# Altium PCB honggan_ant2.PcbDoc
Units mm, origin at the board's own origin, x right, y up, seen from the top; angles counter-clockwise.
Board outline 48 x 36 mm, 4 copper layers (Top Layer, Layer 1, Layer 2, Bottom Layer), stack 0.603 mm thick; 102 components, 55 nets, 316 pads, 698 vias.
Unrouted connection lines stored in the file: 245.
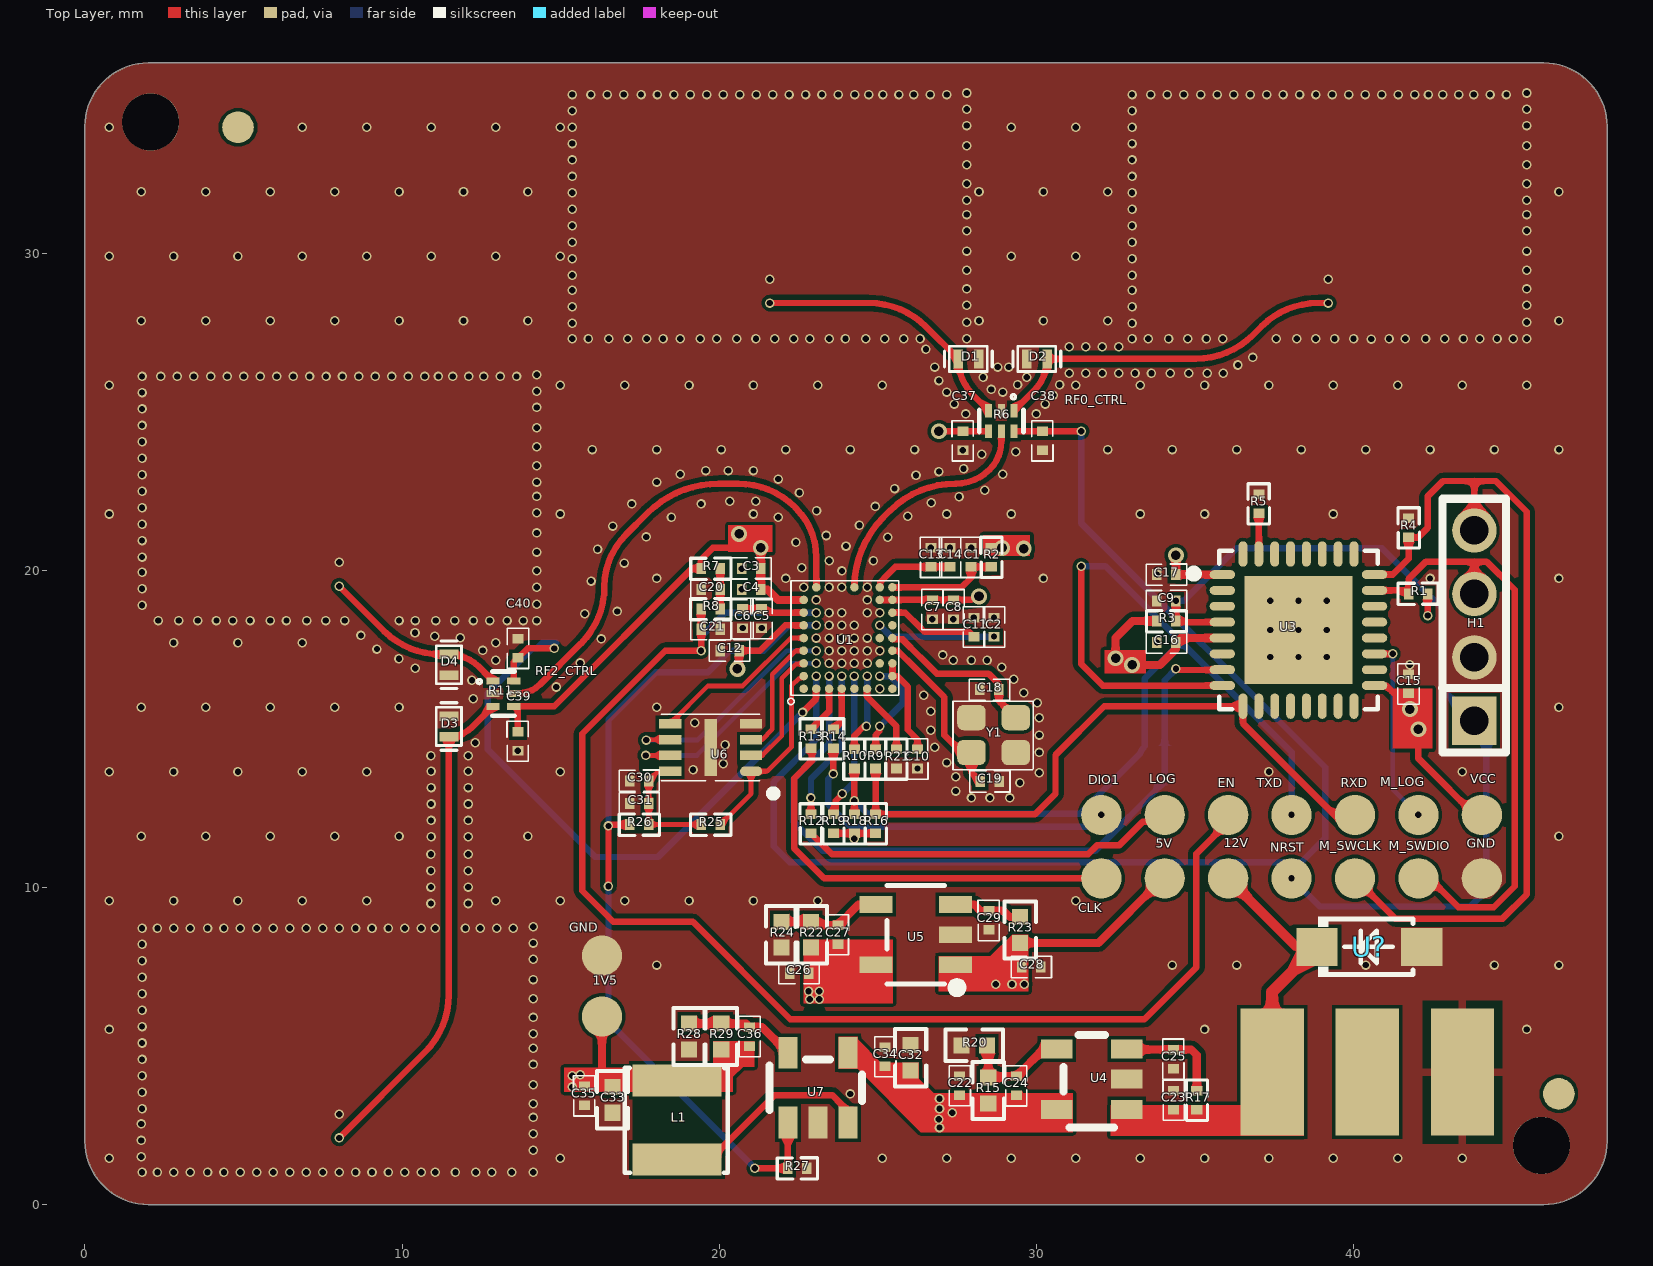
[diagram p0: Top Layer view]
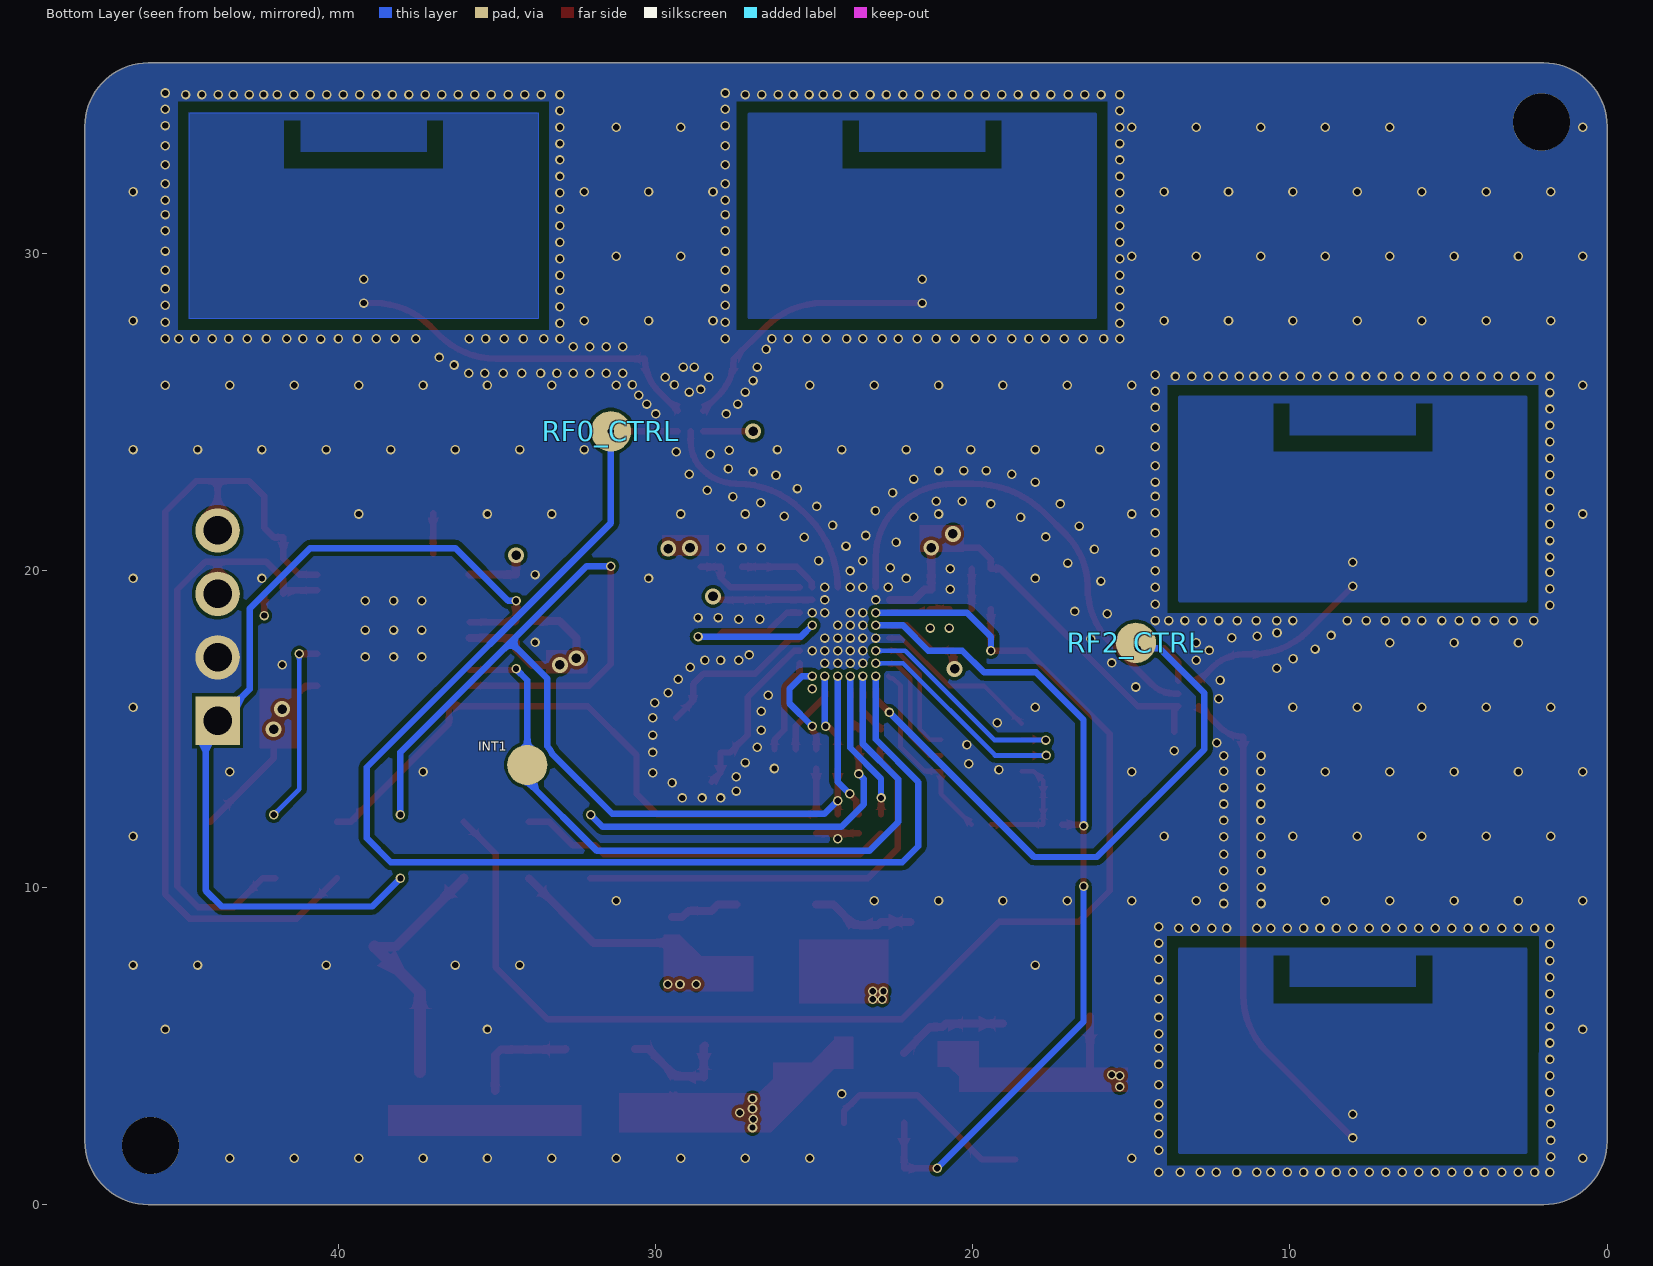
[diagram p1: Bottom Layer view, seen from below]
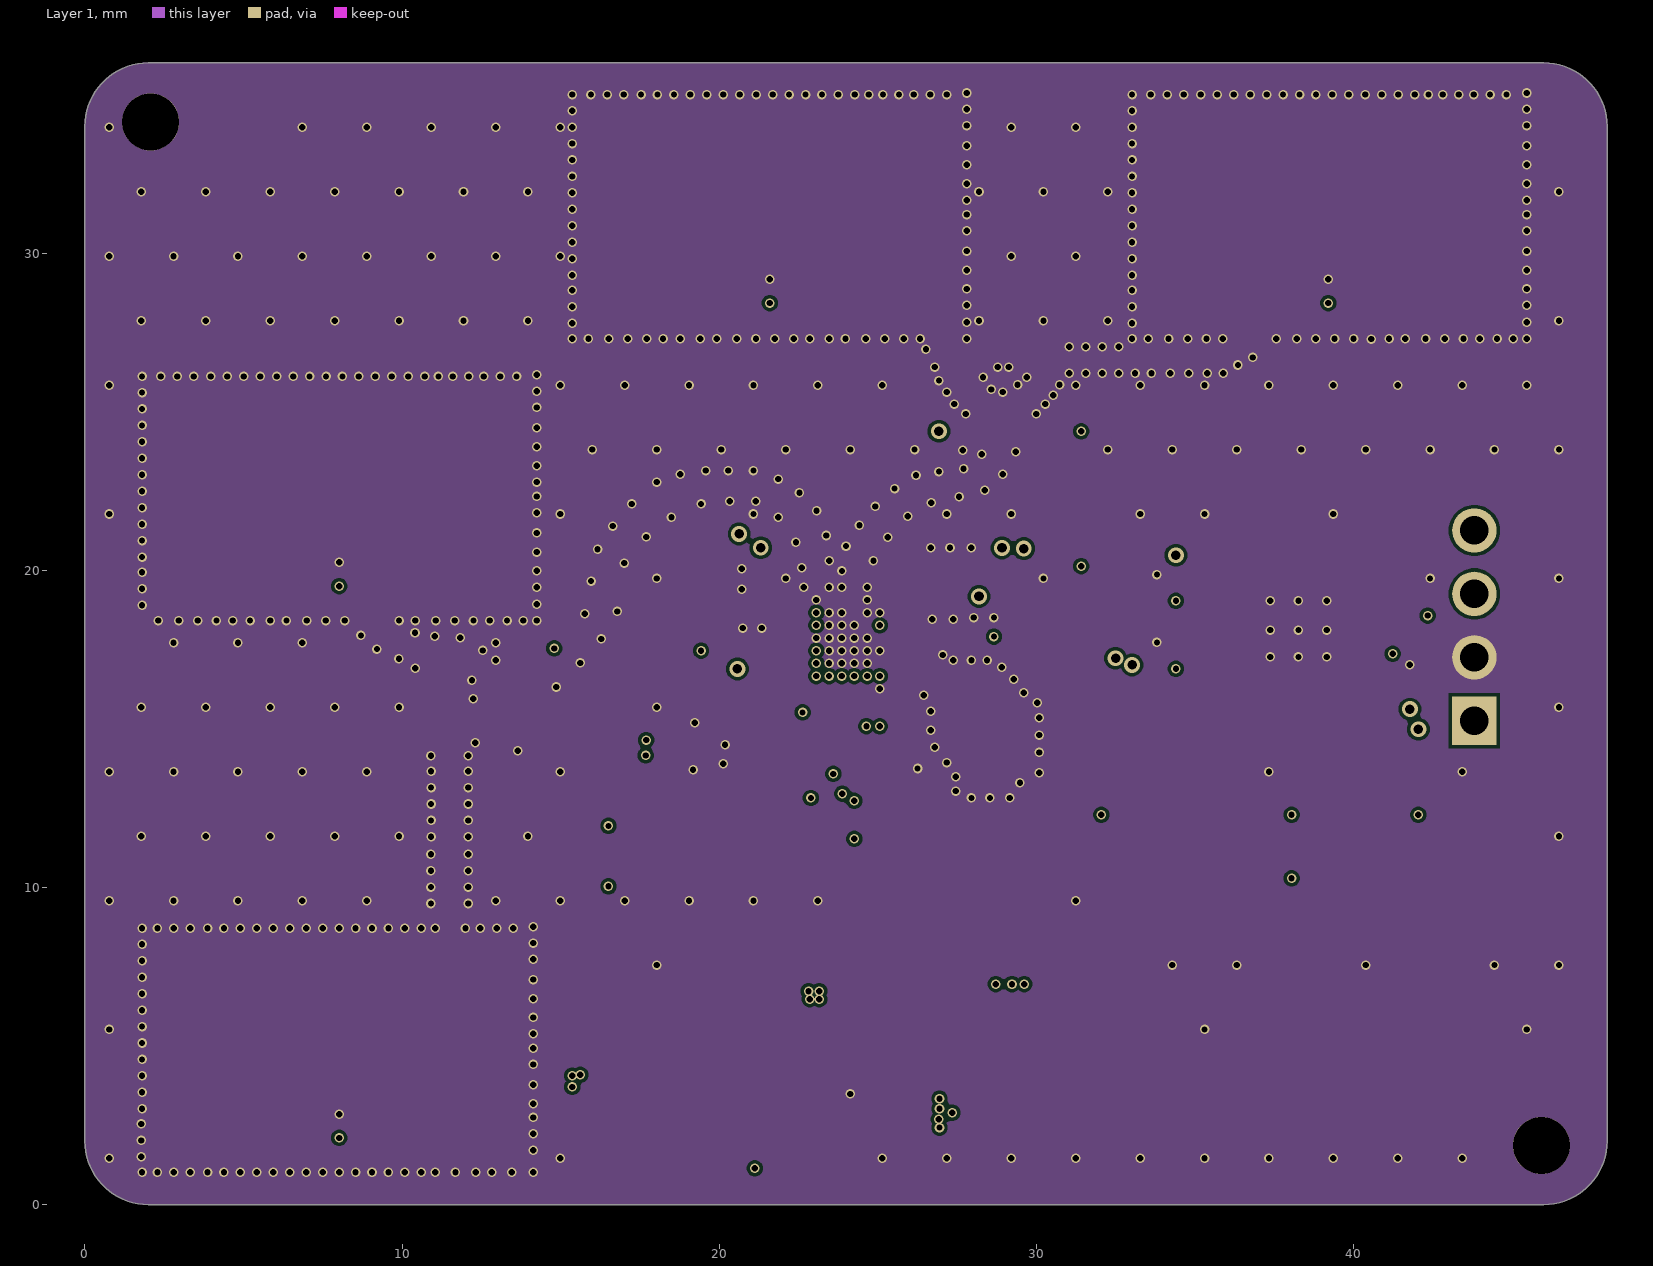
[diagram p2: Layer 1]
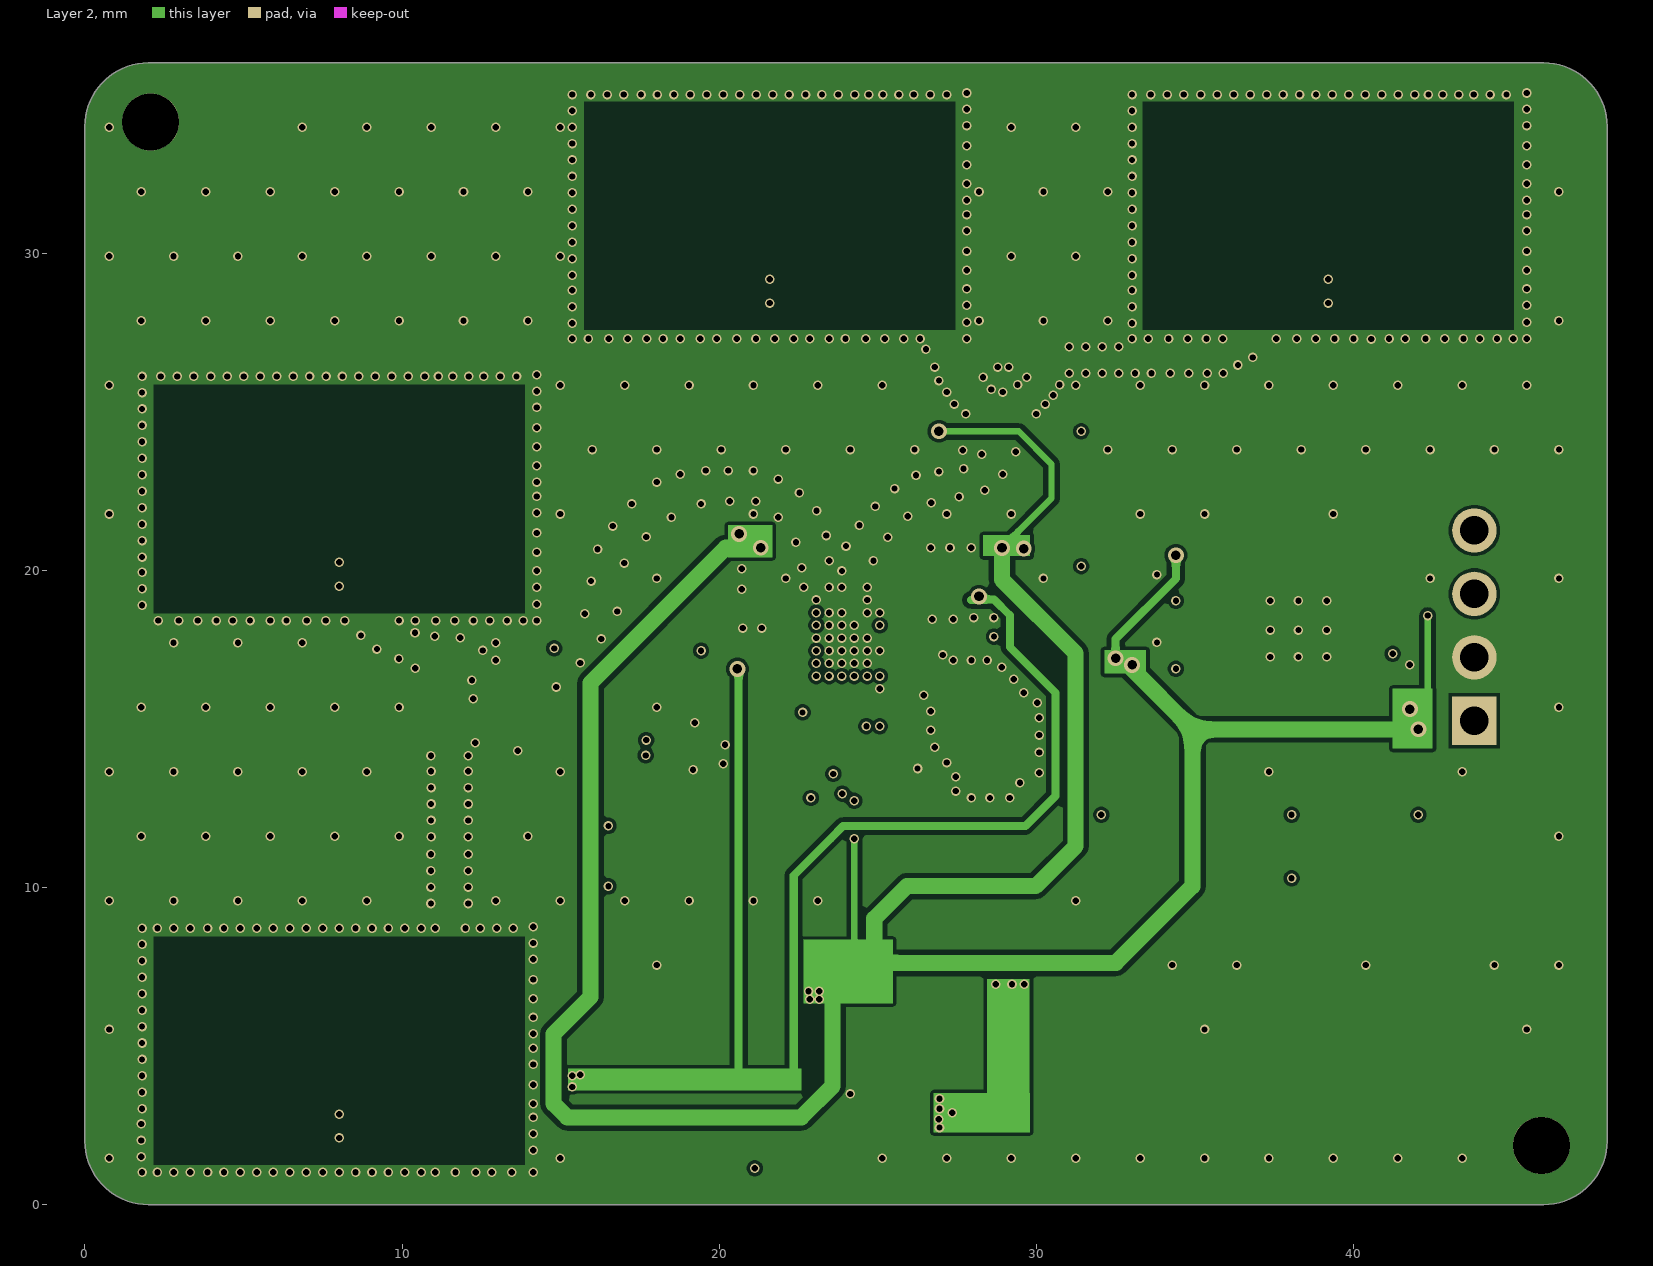
[diagram p3: Layer 2]
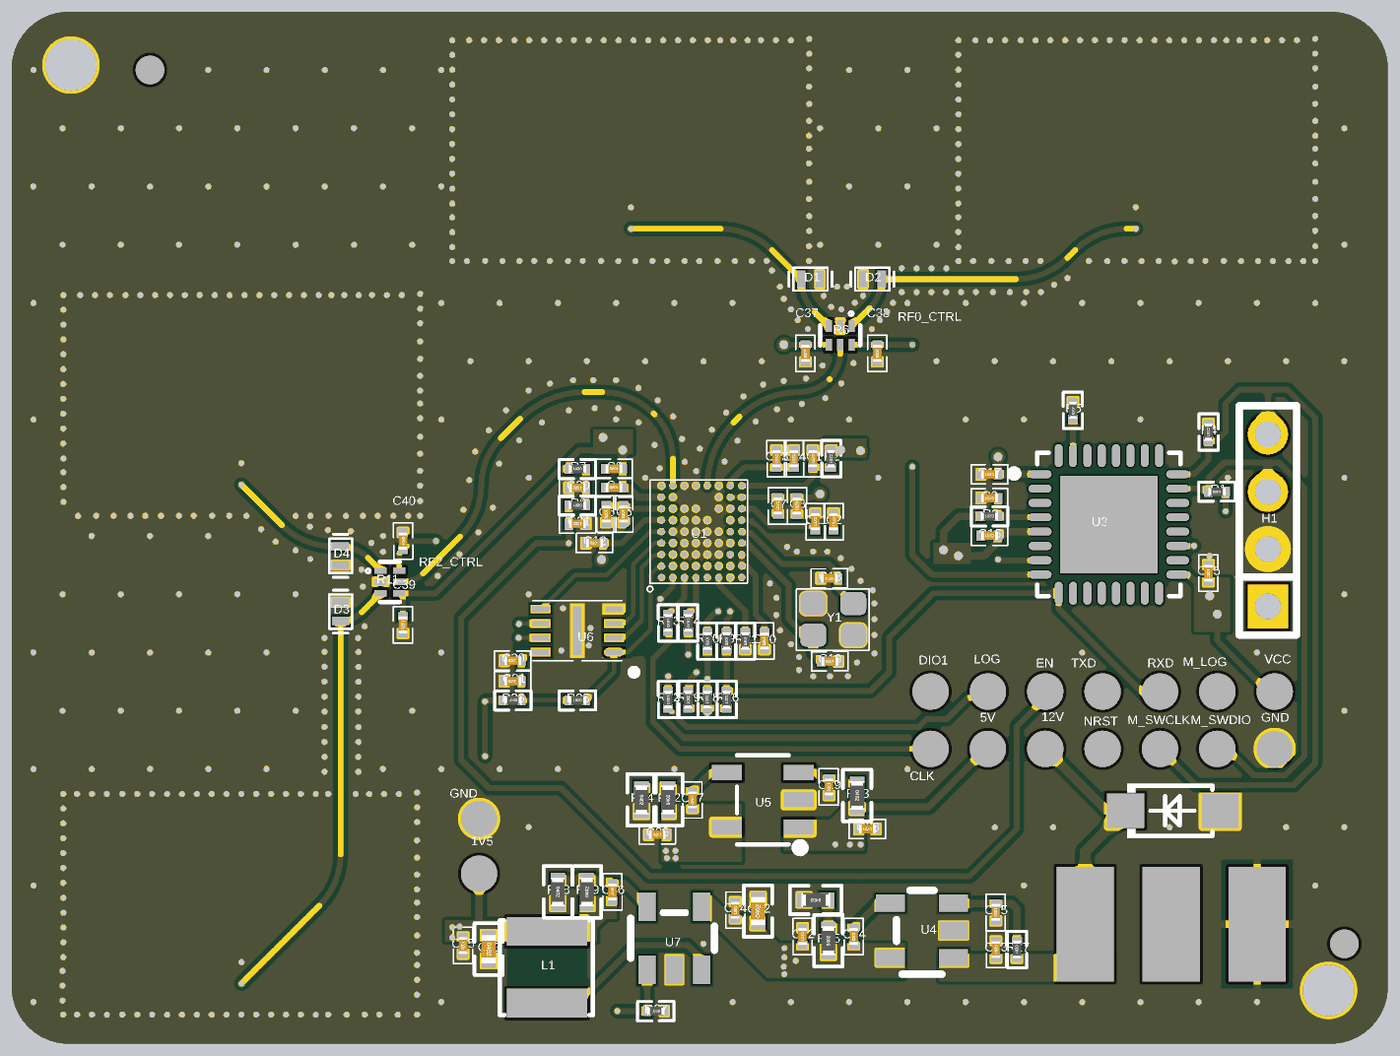
[diagram p4: 3D render of the assembled board from above, using the file's embedded part models]

## Layer stack, top to bottom
Top Solder: solder mask 0.0102, Solder Resist, Dk 3.5
Top Layer: signal copper 0.0356
Dielectric 2: prepreg 0.0711, PP-006, Dk 4.1
Layer 1: signal copper 0.035
Dielectric 1: dielectric 0.32, FR-4, Dk 4.8
Layer 2: signal copper 0.035
Dielectric 3: prepreg 0.0711, PP-006, Dk 4.1
Bottom Layer: signal copper 0.0356
Bottom Solder: solder mask 0.0102, Solder Resist, Dk 3.5

## Board outline
0,2 0,34 cw(c2,34) 2,36 46,36 cw(c46,34) 48,34 48,2 cw(c46,2) 46,0 2,0 cw(c2,2)

## Design rules (kind name [scope] priority, off if disabled: settings)
Clearance [All] p1: gap=0.102 ignorepadtopadclearanceinfootprint=TRUE except(0.099: Via-Via; 0.152: Arc-Fill Arc-Poly Arc-Region Track-Fill Track-Poly Track-Region)
HoleToHoleClearance [All] p1: gap=0 allowstackedmicrovias=TRUE
MinimumSolderMaskSliver [All] p1: minsoldermaskwidth=0
PolygonConnect [All] p1: connectstyle=Direct reliefconductorwidth=0.254 reliefentries=4 polygonreliefangle="90 Angle" airgapwidth=0.254
RoutingVias [All] p1: holewidth=0.711 width=1.27 viastyle="Through Hole" minholewidth=0.711 minwidth=1.27 maxholewidth=0.711 maxwidth=1.27
SilkToSilkClearance [All] p1: silktosilkclearance=0
SilkToSolderMaskClearance [IsPad] p1: minsilkscreentomaskgap=0 clearancetoexposedcopper=TRUE
SolderMaskExpansion [All] p1: expansion=0.102 istentingtop=FALSE
SupplyNets "Schematic Supply Nets_4" [InNet('+12V')] p1: voltage=0.000
SupplyNets "Schematic Supply Nets_3" [InNet('VCC')] p2: voltage=0.000
SupplyNets "Schematic Supply Nets_2" [InNet('+5V')] p3: voltage=0.000
SupplyNets "Schematic Supply Nets_1" [InNet('GND')] p4: voltage=0.000
SupplyNets "Schematic Supply Nets" [InNet('1V5')] p5: voltage=0.000
Width [All] p1: maxlimit=0.508 minlimit=0.127 preferedwidth=0.254
26 further rules are at their usual default settings.

## Components (designator, comment, footprint, x,y, rotation, side; value= is the part's Value field where it differs from the comment)
1V5 "测试点" 测试点_2#1 16.253,7.989 r90 top
5V "测试点" 测试点_2#1 36.108,10.338 r0 top
12V "测试点" 测试点_2#1 36,12.344 r90 top
C1 "1uF_0201" C0201_2 27.946,20.408 r270 top
C2 "1uF_0201" C0201_2 28.667,18.21 r270 top
C3 "1uF_0201" C0201_2 21.012,20.054 r0 top
C4 "10nF_0201" C0201_2 21.01,19.4 r0 top
C5 "1uF_0201" C0201_2 21.34,18.48 r90 top
C6 "10nF_0201" C0201_2 20.74,18.48 r90 top
C7 "1uF_0201" C0201_2 26.722,18.76 r270 top
C8 "10nF_0201" C0201_2 27.387,18.757 r270 top
C9 "0.1uF_0201" C0201_2 34.105,19.036 r180 top
C10 "1uF_0201" C0201_2 26.255,14.05 r90 top
C11 "1uF_0201" C0201_2 28.032,18.21 r270 top
C12 "1uF_0201" C0201_2 20.33,17.465 r0 top
C13 "10nF_0201" C0201_2 26.676,20.408 r270 top
C14 "1uF_0201" C0201_2 27.28,20.408 r270 top
C15 "0.1uF_0201" C0201_2 41.741,16.416 r90 top
C16 "0.1uF_0201" C0201_2 34.105,17.726 r180 top
C17 "0.1uF_0201" C0201_2 34.105,19.866 r180 top
C18 "12pF_0201" C0201_2 28.523,16.238 r180 top
C19 "12pF_0201" C0201_2 28.539,13.338 r0 top
C20 "100nF_0201" C0201_2 19.735,19.394 r0 top
C21 "1uF_0201" C0201_2 19.735,18.14 r0 top
C22 "2.2uF_0201" C0201_2 27.584,3.743 r270 top
C23 "2.2uF_0201" C0201_2 34.327,3.287 r270 top
C24 "100pF_0201" C0201_2 29.374,3.743 r90 top
C25 "0.1uF_0201" C0201_2 34.327,4.587 r90 top
C26 "2.2uF_0201" C0201_2 22.519,7.294 r0 top
C27 "22pF_0201" C0201_2 23.749,8.509 r90 top
C28 "1uF_0201" C0201_2 29.845,7.493 r180 top
C29 "0.1uF_0201" C0201_2 28.504,8.959 r90 top
C30 "1uF 0201" C0201_2 17.481,13.362 r0 top
C31 "10nF 0201" C0201_2 17.481,12.652 r0 top
C32 "10uF 0402" C0402 26.035,4.63 r90 top
C33 "10uF 0402" C0402 16.637,3.302 r270 top
C34 "10nF_0201" C0201_2 25.236,4.658 r270 top
C35 "10nF_0201" C0201_2 15.748,3.429 r90 top
C36 "47pF_0201" C0201_2 20.952,5.297 r270 top
C37 "100pF_0201" C0201_2 27.686,24.084 r90 top
C38 "100pF_0201" C0201_2 30.195,24.084 r90 top
C39 "100pF_0201" C0201_2 13.651,14.612 r90 top
C40 "100pF_0201" C0201_2 13.651,17.536 r270 top
CLK "测试点" 测试点_2#1 32,12.344 r90 top
D1 "h5vl10b" SOD-882_L1.0-W0.6-BI 27.861,26.67 r180 top
D2 "h5vl10b" SOD-882_L1.0-W0.6-BI 30.02,26.67 r180 top
D3 "h5vl10b" SOD-882_L1.0-W0.6-BI 11.475,15.075 r270 top
D4 "h5vl10b" SOD-882_L1.0-W0.6-BI 11.475,17.023 r270 top
DIO1 "测试点" 测试点_2#1 32,14.344 r90 top
EN "测试点" 测试点_2#1 36,14.344 r90 top (schematic designator EN1)
GND "测试点" 测试点_2#1 16.253,9.906 r90 top
GND "测试点" 测试点_2#1 44,12.344 r90 top (schematic designator GND1)
H1 "ph2.0-01-04pzd" HDR-TH_4P-P2.00-V-M 43.815,18.256 r90 top
INT1 "测试点" 测试点_2#1 34.102,15.919 r90 bottom
L1 "2.2uH-3X3MM" 贴片电感(3*3MM)(3010) 18.669,2.667 r270 top value=2.2uH/3*3
LOG "测试点" 测试点_2#1 34,14.344 r90 top (schematic designator LOG1)
M_LOG "测试点" 测试点_2#1 42,14.344 r90 top
M_SWCLK "" 测试点_2#1 40,12.344 r90 top
M_SWDIO "测试点" 测试点_2#1 44.108,10.338 r0 top
NRST "测试点" 测试点_2#1 38,12.344 r90 top
R1 "10K 0201" R0201 42.041,19.256 r0 top
R2 "20R 0201" R0201 28.581,20.408 r270 top
R3 "10K 0201" R0201 34.105,18.401 r180 top
R4 "10K 0201" R0201 41.741,21.336 r270 top
R5 "10K 0201" R0201 37.018,22.098 r90 top
R6 "fm8625h" DFN-6_L1.1-W0.7-P0.40-BL 28.899,24.709 r180 top
R7 "100K 0201" R0201 19.735,20.054 r180 top
R8 "10K 0201" R0201 19.732,18.78 r180 top
R9 "47R 0201" R0201 24.935,14.05 r90 top
R10 "47R 0201" R0201 24.265,14.05 r90 top
R11 "fm8625h" DFN-6_L1.1-W0.7-P0.40-BL 13.196,16.112 r270 top
R12 "47R 0201" R0201 22.895,12.007 r90 top
R13 "47R 0201" R0201 22.895,14.683 r90 top
R14 "47R 0201" R0201 23.6,14.683 r90 top
R15 "47K_0402" R0402 28.485,3.596 r90 top
R16 "100K 0201" R0201 24.935,12.007 r270 top
R17 "4.7K 0201" R0201 35.061,3.287 r270 top
R18 "100K 0201" R0201 24.265,12.007 r270 top
R19 "100K 0201" R0201 23.6,12.007 r270 top
R20 "15K_0402" R0402 28.045,5.017 r180 top
R21 "100K 0201" R0201 25.59,14.05 r90 top
R22 "31.6K_0402" R0402 22.902,8.509 r90 top
R23 "10K_0402" R0402 29.489,8.659 r270 top
R24 "10K_0402" R0402 21.968,8.509 r270 top
R25 "100K 0201" R0201 19.732,11.982 r180 top
R26 "0R 0201" R0201 17.481,11.982 r180 top
R27 "100K 0201" R0201 22.464,1.143 r180 top
R28 "20K_0402" R0402 19.05,5.297 r270 top
R29 "30K_0402" R0402 20.066,5.297 r90 top
RF0_CTRL "测试点" 测试点_2#2 31.363,26.441 r90 top
RF2_CTRL "测试点" 测试点_2#2 14.808,19.769 r90 top
RXD "测试点" 测试点_2#1 40,14.344 r90 top (schematic designator RXD1)
TXD "测试点" 测试点_2#1 38,14.344 r90 top (schematic designator TXD1)
U1 "CBU5000V210" BGA_CBU5000V210 22.665,16.265 r90 top
U3 "gd32e230k8u6" QFN-32_L5.0-W5.0-P0.50-BL-EP3.4 38.269,18.116 r270 top
U4 "sgm2210" SOT-23-5_L2.9-W1.6-P0.95-LS2.8-BL 31.75,3.952 r90 top
U5 "eta5050v0s2f" SOT-23-5_L3.0-W1.5-P0.95-LS2.8-BL 26.199,8.509 r90 top
U6 "FLASHMEM2X3" USON8L 21.007,13.662 r180 top
U7 "eta3485s2f" SOT-23-5_L2.9-W1.6-P0.95-LS2.8-BL 23.114,3.683 r0 top
U? "smf18a_c19077512" SOD-123FL_L2.8-W1.8-LS3.8-R-RD 40.503,8.128 r0 top
VCC "测试点" 测试点_2#1 44,14.344 r90 top
Y1 "XTAL2016" SMD2016 28.657,14.805 r180 top

## Footprints (in the part's own frame and the unit in brackets; to place one, negate y for a bottom-side part, rotate by r counter-clockwise, add the part's x,y. Pads: shape width x height; smd on the part's side, far side on the other; paste and mask are expansions set on the pad)
BGA_CBU5000V210 [mm]
  round 0.27 smd paste-2539.97 mask-2539.97: A1(0,0) A2(0.4,0) A3(0.8,0) A4(1.2,0) A5(1.6,0) A6(2,0) A7(2.4,0) A8(2.8,0) A9(3.2,0) B1(0,-0.4) B2(0.4,-0.4) B3(0.8,-0.4) B4(1.2,-0.4) B5(1.6,-0.4) B6(2,-0.4) B7(2.4,-0.4) B8(2.8,-0.4) B9(3.2,-0.4) C1(0,-0.8) C2(0.4,-0.8) C3(0.8,-0.8) C4(1.2,-0.8) C5(1.6,-0.8) C6(2,-0.8) C7(2.4,-0.8) C9(3.2,-0.8) D1(0,-1.2) D2(0.4,-1.2) D3(0.8,-1.2) D4(1.2,-1.2) D5(1.6,-1.2) D6(2,-1.2) D7(2.4,-1.2) D9(3.2,-1.2) E1(0,-1.6) E2(0.4,-1.6) E3(0.8,-1.6) E4(1.2,-1.6) E5(1.6,-1.6) E6(2,-1.6) E9(3.2,-1.6) F1(0,-2) F2(0.4,-2) F3(0.8,-2) F4(1.2,-2) F5(1.6,-2) F7(2.4,-2) F8(2.8,-2) F9(3.2,-2) G1(0,-2.4) G2(0.4,-2.4) G3(0.8,-2.4) G4(1.2,-2.4) G5(1.6,-2.4) G6(2,-2.4) G7(2.4,-2.4) G8(2.8,-2.4) G9(3.2,-2.4) H1(0,-2.8) H2(0.4,-2.8) H3(0.8,-2.8) H4(1.2,-2.8) H5(1.6,-2.8) H6(2,-2.8) H7(2.4,-2.8) H8(2.8,-2.8) H9(3.2,-2.8)
  silkscreen extent -0.5,-3 3.4,0.5
C0201_2 [mm]
  rect 0.3x0.35 smd mask+0.05: 1(-0.3,0) 2(0.3,0)
  silkscreen extent -0.64,-0.33 0.63,0.34, body extent -0.3,-0.16 0.3,0.16, height 0.31
C0402 [mil]
  rect 20x20 smd mask+2: 1(-16,0) 2(16,0)
  silkscreen extent -35,-20 36,20, body extent -20,-10 20,10, height 20
DFN-6_L1.1-W0.7-P0.40-BL [mm]
  rect 0.22x0.42 smd: 1(-0.4,-0.325) 2(0,-0.325) 3(0.4,-0.325) 4(0.4,0.325) 5(0,0.325) 6(-0.4,0.325)
  silkscreen extent -0.7,-0.83 0.7,0.35
HDR-TH_4P-P2.00-V-M [mm]
  rect 1.524x1.4 hole 0.9: 1(-3,0)
  round 1.4 hole 0.9: 2(-1,0) 3(1,0) 4(3,0)
  silkscreen extent -4,-1 4,1.02
QFN-32_L5.0-W5.0-P0.50-BL-EP3.4 [mm]
  oval 0.28x0.8 smd paste+0 mask+0.05: 1(-1.75,-2.4) 2(-1.25,-2.4) 3(-0.75,-2.4) 4(-0.25,-2.4) 5(0.25,-2.4) 6(0.75,-2.4) 7(1.25,-2.4) 8(1.75,-2.4) 17(1.75,2.4) 18(1.25,2.4) 19(0.75,2.4) 20(0.25,2.4) 21(-0.25,2.4) 22(-0.75,2.4) 23(-1.25,2.4) 24(-1.75,2.4)
  oval 0.8x0.28 smd paste+0 mask+0.05: 9(2.4,-1.75) 10(2.4,-1.25) 11(2.4,-0.75) 12(2.4,-0.25) 13(2.4,0.25) 14(2.4,0.75) 15(2.4,1.25) 16(2.4,1.75) 25(-2.4,1.75) 26(-2.4,1.25) 27(-2.4,0.75) 28(-2.4,0.25) 29(-2.4,-0.25) 30(-2.4,-0.75) 31(-2.4,-1.25) 32(-2.4,-1.75)
  rect 3.4x3.4 smd paste+0 mask+0.05: 33(0,0)
  silkscreen extent -2.5,-3.43 2.5,2.5
R0201 [mm]
  rect 0.3x0.35 smd mask+0.05: 1(-0.3,0) 2(0.3,0)
  silkscreen extent -0.64,-0.33 0.63,0.34, body extent -0.3,-0.15 0.3,0.15, height 0.23
R0402 [mil]
  rect 20x20 smd mask+2: 1(16,0) 2(-16,0)
  silkscreen extent -35,-20 36,20, body extent -20,-10 20,10, height 12
SMD2016 [mm] "不常用，单价高，"
  rrect50% 0.9x0.8 smd mask+0.05: 1(0.7,0.55) 2(-0.7,0.55) 3(-0.7,-0.55) 4(0.7,-0.55)
  silkscreen extent -1.25,-1.06 1.28,1.09, body extent -1.01,-0.8 1,0.81, height 0.66
SOD-123FL_L2.8-W1.8-LS3.8-R-RD [mm]
  rect 1.3x1.2 smd: 1(1.65,0) 2(-1.65,0)
  silkscreen extent -1.6,-0.95 1.38,0.95
SOD-882_L1.0-W0.6-BI [mm]
  rect 0.3x0.6 smd paste+0 mask+0.05: 1(-0.325,0) 2(0.325,0)
  silkscreen extent -0.75,-0.4 0.75,0.4
SOT-23-5_L2.9-W1.6-P0.95-LS2.8-BL [mm]
  rect 0.599x1.001 smd paste+0 mask+0.051: 1(-0.95,-1.1) 2(0,-1.1) 3(0.95,-1.1) 4(0.95,1.1) 5(-0.95,1.1)
  silkscreen extent -1.52,-0.7 1.4,0.89
SOT-23-5_L3.0-W1.5-P0.95-LS2.8-BL [mm]
  rect 0.531x1.044 smd: 1(-0.95,-1.25) 2(0,-1.25) 3(0.95,-1.25) 4(0.95,1.25) 5(-0.95,1.25)
  silkscreen extent -1.82,-1.45 1.55,0.9
USON8L [mm]
  oval 0.7x0.3 smd paste-2539.97 mask-2539.97: 1(0,0)
  rect 0.7x0.3 smd paste-2539.97 mask-2539.97: 2(0,-0.5) 3(0,-1) 4(0,-1.5) 5(2.55,-1.5) 6(2.55,-1) 7(2.55,-0.5) 8(2.55,0)
  rect 0.4x1.8 smd paste-2539.97 mask-2539.97: 9(1.275,-0.75)
  silkscreen extent -0.8,-1.8 2.83,0.8
测试点_2#1 [mil]
  round 50 smd: 1(-81,-2)
测试点_2#2 [mil]
  round 50 smd far side: 1(-81,-2)
贴片电感(3*3MM)(3010) [mm]
  rect 1x2.8 smd: 1(1.247,0) 2(-1.247,0)
  Top Layer pour cut-out: -0.746,1.405 0.747,1.405 0.747,-1.4 -0.75,-1.4
  silkscreen extent -1.64,-1.64 1.66,1.61, body extent -1.55,-1.4 1.57,1.4, height 1.5

## Part data
C1 C2 C3 C4 C5 C6 C7 C8 C9 C10 C11 C12 C13 C14 C15 C16 C17 C18 C19 C20 C21 C22 C23 C24 C25 C26 C27 C28 C29 C34 C35 C36 C37 C38 C39 C40: library part CAP_0201, Part Name="CAP 0402", Part Number=700011020031, ID=499, Module=0, Part Type=MLCC\SMT\0402\X5R\16V, Priority=S, Process=SMT, Specification=spec
C30 C31: library part CAP_0201, "贴片电容 0201", Part Name="CAP 0402", Part Number=700011020031, ID=499, Module=0, Part Type=MLCC\SMT\0402\X5R\16V, Priority=S, Process=SMT, Specification=spec
C32 C33: library part CAP_0402, "贴片电容 0402"
D1 D2 D3 D4: "极性:双向;反向截止电压(Vrwm):5V;钳位电压:10V;峰值脉冲电流(Ipp):5A;峰值脉冲功率(Ppp):50W;击穿电压(VBR):5.6V;", Clamping Voltage=10V, JLCPCB Part Class="Extended Part", Junction Capacitance=15pF, LCSC Part Name="丝印 PB 双向ESD 5V截止 峰值浪涌电流：5A", Manufacturer=R+O(宏嘉诚), ManufacturerPart=H5VL10B, Operating Temperature=-55℃~+125℃, Peak Pulse Current (Ipp)=5A, Peak Pulse Power Dissipation (Ppp)=50W, Reverse Leakage Current (Ir)=100nA, Reverse Stand-Off Voltage (Vrwm)=5V, Voltage - Breakdown=5.6V, AddInBom=yes, ConvertToPcb=yes, Datasheet=https://item.szlcsc.com/datasheet/H5VL10B/8397194.html, FootprintName=SOD-882_L1.0-W0.6-BI, level of protection="IEC 61000-4-2；IEC 61000-4-5", ModelId=4b1e2a6d6b7148bca7e5c05c116db5a9, ModelName=SOD-882_L1.0-W0.6-BI, ModelTransform=39.37,23.626,0,0,0,0,0,0,0, Number of Channels=单路, Polarity=双向, Supplier=LCSC, Supplier Footprint=DFN1006-2L, SupplierPart=C7420372, Symbol=H5VL10B, Type=ESD
H1: "2.0PH H2.0 1x4Pin 180度 PC2.8 PA3.9 PB2.0 L8.7 6T 常规", JLCPCB Part Class="Extended Part", Manufacturer=XUNPU(讯普), ManufacturerPart=PH2.0-01-04PZD, AddInBom=yes, ConvertToPcb=yes, Datasheet=https://item.szlcsc.com/datasheet/PH2.0-01-04PZD/51736330.html, FootprintName=HDR-TH_4P-P2.00-V-M, LCSC Part Name="2.0PH H2.0 1x4Pin 180度 PC2.8 PA3.9 PB2.0 L8.7 6T 常规", ModelId=951c01626b194dc4b1ce9a294ce0ccd7, ModelName=HDR-TH_4P-P2.00-M-LI-1X4P, ModelTransform=314.96,78.74,0,0,0,0,0,0,-118.11, Supplier=LCSC, Supplier Footprint=插件,P=2mm, SupplierPart=C49286571, Symbol=PH2.0-01-04PZD
L1: library part IND_2.2UH_3X3MM, "ind,2.2uH,1A,smd,3*3*1.5MM", Manufacturer #1=Murata, Article Number=11400007, Geometry.Height=3mm, PCB DECAL=IND-SMD-3X3MM
M_SWCLK: library part 测试点
R1 R2 R3 R4 R5 R7 R8 R9 R10 R12 R13 R14 R16 R17 R18 R19 R21 R25 R26 R27: library part RES_0201, "贴片电阻 0201", PCB DECAL=0201/4
R6 R11: "频率:100MHz~6GHz;隔离度:30dB;插入损耗:0.45dB;", Frequency range=100MHz~6GHz, JLCPCB Part Class="Extended Part", LCSC Part Name=5G应用单刀双掷射频开关, Manufacturer=FM(富满), ManufacturerPart=FM8625H, Operating Temperature=-40℃~+90℃, Voltage - Supply=1.62V~3.3V, AddInBom=yes, Circuit=单刀双掷, ConvertToPcb=yes, Datasheet=https://item.szlcsc.com/datasheet/FM8625H/3057622.html, Features=集成控制逻辑, FootprintName=DFN-6_L1.1-W0.7-P0.40-BL, Insertion loss=0.45dB, isolation=30dB, ModelId=eb005b8a66a14fc5b68f6e6c69304dc0, ModelName=DFN-6_L1.1-W0.7-H0.5-P0.40-BL, ModelTransform=44.0944,28.3464,0,0,0,0,0,0,0, P1dB=38dBm, Supplier=LCSC, Supplier Footprint=DFN-6(0.7x1.1), SupplierPart=C2857391, Symbol=FM8625H
R15 R20 R22 R23 R24 R28 R29: library part RES_0402, Material (Resistor)=TF, NUM_RESISTORS=1, PEAK_REFLOW_TEMP=260, Power Rating (Max) (W)=1/20W, PSpiceTemplate="R^@REFDES %1 %2 ?TOLERANCE|R^@REFDES| @VALUE  ?TOLERANCE|\n.model R^@REFDES RES R=1 DEV=@TOLERANCE%|", AMBIQ_PN=AM-01-2915, DISTRIBUTOR=MOUSER, DISTRIBUTOR_PN=667-ERJ-1GNF1003C, FPLIST=RC0201,RC0201_CC, HEIGHT="0.26 MM", LEAD_FREE=Yes, Manufacturer_Datasheet=http://www.mouser.com/ds/2/315/AOA0000C304-1149620.pdf, MFG_NAME=PANASONIC, MFG_PN=ERJ-1GNF1003C, PART_TYPE=0201, PCB_FOOTPRINT_OPTIONS=s0402_l, ROHS=Yes, STATUS=Production, TOL=1%, Type=SMD
U3: "CPU内核:ARM Cortex-M系列;CPU最大主频:72MHz;", JLCPCB Part Class="Extended Part", LCSC Part Name="ARM Cortex-M23 32位微控制器（MCU）", Manufacturer=GigaDevice(兆易创新), ManufacturerPart=GD32E230K8U6, Voltage - Supply=1.8V~3.6V, ADC (Bit)=12bit, AddInBom=yes, ConvertToPcb=yes, CPU Core="ARM Cortex-M系列", CPU Maximum Speed=72MHz, Datasheet=https://item.szlcsc.com/datasheet/GD32E230K8U6/352856.html, FootprintName=QFN-32_L5.0-W5.0-P0.50-BL-EP3.4, ModelId=9cd7b3b2e5534eca85488abae33e32e3, ModelName=QFN-32_L5.0-W5.0-H0.9-P0.50, ModelTransform=197.6374,197.6374,0,90,0,0,-0.789,-0.395,0, Number of I/O=27, Program Memory Type=FLASH, Program Storage Size=64KB, Supplier=LCSC, Supplier Footprint=QFN-32-EP(5x5), SupplierPart=C380536, Symbol=GD32E230K8U6
U4: library part sgm2210-5.0xn5g/tr, "输出极性:正极;工作电压:20V;输出电压:5V;输出电流:300mA;电源纹波抑制比(PSRR):100dB@(1kHz);输出类型:固定;", JLCPCB Part Class="Extended Part", LCSC Part Name="5V 300mA 20V", Manufacturer=SGMICRO(圣邦微), ManufacturerPart=SGM2210-5.0XN5G/TR, Operating Temperature=-40℃~+125℃@(Tj), Output Current=300mA, Output Voltage=5V, Power Supply Rejection Ratio (PSRR)=100dB@(1kHz), standby current=36uA, Voltage - Supply=20V, Voltage Dropout=-, AddInBom=yes, ConvertToPcb=yes, Datasheet=https://item.szlcsc.com/datasheet/SGM2210-5.0XN5G%252FTR/5779520.html, Features=使能控制；短路保护；过流保护；反极性电流保护；输出放电；热关断, FootprintName=SOT-23-5_L2.9-W1.6-P0.95-LS2.8-BL, ModelId=018c57e721114987ae90467fe9f1d259, ModelName=SOT-23-5_L2.9-W1.6-P0.95-LS2.8-BL, ModelTransform=114.96,110.236,0,0,0,0,0,0,0, Noise=48uVrms, Number of Outputs=1, Output Configuration=正极, Output Type=固定, Supplier=LCSC, Supplier Footprint=SOT-23-5, SupplierPart=C5152792, Symbol=SGM2210-5.0XN5G/TR
U5: "输出极性:正极;工作电压:6V;输出电压:800mV~6V;输出电流:500mA;电源纹波抑制比(PSRR):73dB@(100Hz);输出类型:可调;", JLCPCB Part Class="Extended Part", LCSC Part Name="1V 500mA 6V", Manufacturer=ETA(钰泰), ManufacturerPart=ETA5050V0S2F, Operating Temperature=-40℃~+85℃, Output Current=500mA, Output Voltage=800mV~6V, Power Supply Rejection Ratio (PSRR)=73dB@(100Hz), standby current=37uA, Voltage - Supply=6V, Voltage Dropout=370mV@(500mA), AddInBom=yes, ConvertToPcb=yes, Datasheet=https://item.szlcsc.com/datasheet/ETA5050V0S2F/8453546.html, Features=短路保护；使能控制；热关断, FootprintName=SOT-23-5_L3.0-W1.5-P0.95-LS2.8-BL, ModelId=424d41c645fb4cc2a3598f66fad27964, ModelName=SOT-23-5_L3.0-W1.5-P0.95-LS2.8-BL, ModelTransform=118.11,110.236,0,0,0,0,0,0,0, Noise=50uVrms, Number of Outputs=1, Output Configuration=正极, Output Type=可调, Supplier=LCSC, Supplier Footprint=SOT23-5, SupplierPart=C7436029, Symbol=ETA5050V0S2F
U6: library part FLASH_UW, "FLASH"
U7: library part eta3485s2f_c7465518, "功能类型:降压型;工作电压:2.6V~7V;输出电压:600mV~7V;输出电流:1.5A;输出类型:可调;", Frequency - Switching=2MHz, JLCPCB Part Class="Extended Part", LCSC Part Name="降压型 1.5A 2.6V~7V", Manufacturer=ETA(钰泰), ManufacturerPart=ETA3485S2F, Operating Temperature=-40℃~+85℃@(TA), Output Current=1.5A, Output Voltage=600mV~7V, Quiescent Current=20uA, Voltage - Supply=2.6V~7V, AddInBom=yes, ConvertToPcb=yes, Datasheet=https://item.szlcsc.com/datasheet/ETA3485S2F/8507055.html, Features=逐波限流；过流保护；EMI优化(抖频模式), FootprintName=SOT-23-5_L2.9-W1.6-P0.95-LS2.8-BL, Function=降压型, ModelId=018c57e721114987ae90467fe9f1d259, ModelName=SOT-23-5_L2.9-W1.6-P0.95-LS2.8-BL, ModelTransform=114.96,110.236,0,0,0,0,0,0,0, Number of Outputs=1, Output Type=可调, Supplier=LCSC, Supplier Footprint=SOT23-5, SupplierPart=C7465518, Switch tube (built-in/external)=内置, Symbol=ETA3485S2F_C7465518, Synchronous Rectifier=是, Topology=降压式
U?: "极性:单向;反向截止电压(Vrwm):18V;钳位电压:29.2V;峰值脉冲电流(Ipp):6.8A@10/1000us;峰值脉冲功率(Ppp):200W@10/1000us;击穿电压:22.1V;", Clamping Voltage=29.2V, JLCPCB Part Class="Extended Part", LCSC Part Name="单向TVS 18V截止 峰值浪涌电流：6.8A@10/1000us", Manufacturer=R+O(宏嘉诚), ManufacturerPart=SMF18A, Operating Temperature=-55℃~+150℃, Peak Pulse Current (Ipp)=6.8A@10/1000us, Peak Pulse Power Dissipation (Ppp)=200W@10/1000us, Reverse Leakage Current (Ir)=1uA, Reverse Stand-Off Voltage (Vrwm)=18V, Voltage - Breakdown=22.1V, AddInBom=yes, ConvertToPcb=yes, Datasheet=https://item.szlcsc.com/datasheet/SMF18A/20275597.html, FootprintName=SOD-123FL_L2.8-W1.8-LS3.8-R-RD, level of protection="IEC 61000-4-2", ModelId=c9a38256a2424d8b9727054099342ef3, ModelName=SOD-123FL_L2.8-W1.8-LS3.8-RD, ModelTransform=141.732,70.866,0,0,0,0,0,0,0, Polarity=单向, Supplier=LCSC, Supplier Footprint=SOD-123FL, SupplierPart=C19077512, Symbol=SMF18A_C19077512, Type=TVS
Y1: "32MHz XTAL 10PPM", Manufacturer_Name=ECS, Manufacturer_Part_Number=ECS-TXO-2016-33-500-TR, Mouser Part Number=520-TXO-2016-33-500T, Datasheet Link=https://www.mouser.co.uk/datasheet/2/122/ECS-TXO-2016-1601065.pdf, Geometry.Height=0.8mm, Mouser Price/Stock=https://www.mouser.co.uk/ProductDetail/ECS/ECS-TXO-2016-33-500-TR?qs=PzGy0jfpSMtsWDXnTYS%2FFQ%3D%3D, PCB DECAL=ECSTXO2520

## Free pads (board coordinates)
  rect 2x4 smd: BUS(40.44,4.175) ""(37.44,4.175) ""(43.44,4.175)
  round 1.8 hole 1.8 unplated: MH133(2.07,34.138) MH133(45.93,1.862)
  round 1 smd: MH134(4.826,33.968) MH134(46.482,3.488)

## Via types
v1: diameter 0.3, hole 0.2, Top Layer to Bottom Layer, tented both sides, 686 vias
v2: diameter 0.5, hole 0.3, Top Layer to Bottom Layer, tented both sides, 12 vias

## Nets (pads, with @x,y where several pads share a name; then routed paths per layer and width w, separated by ;. In a path a pad name is that pad's centre, name@x,y a point inside that pad or via, vN(x,y) a via of type N, cw(c..) or ccw(c..) an arc to the next point about the centre after c; other vN are vias at no path point)
1V5: 1V5.1 C7.1 C8.1 C12.2 C33.1 C35.2 C36.2 L1.2 R29.2 U1.A6 U1.G8 U1.H8 | length 44.4
  Top Layer w0.203: v2@20.617,16.779 20.624,16.786 20.624,17.458 C12.2 21.285,17.465 22.085,18.265 U1.A6 ; U1.G8 U1.H8 27.946,19.065
  Top Layer w0.254: 1V5.1 16.304,4.164 16.381,4.087
  Layer 2 w0.254: 20.447,3.946 20.617,4.116 v2@20.617,16.779 ; 22.225,3.81 22.352,3.937 22.352,10.377 23.505,11.53 23.909,11.934 29.66,11.934 30.607,12.881 30.607,16.139 29.165,17.581 29.165,18.584 28.671,19.078 28.207,19.078 28.194,19.065 27.946,19.065
  other v1: 15.367,3.708 15.367,4.064 15.623,4.087
  other v2: 20.574,16.891 28.194,19.177
+5V: 5V.1 C22.2 C24.1 C28.2 C32.1 C34.2 R15.2 R23.1 U4.5 U5.1 U7.4 | length 6.8
  Top Layer w0.254: C24.1 29.815,3.002 U4.5 ; R23.1 31.966,8.253 5V.1@34,10.287
  other v1: 26.949,2.428 26.927,2.694 27.352,2.894 26.949,3.019 26.949,3.337 28.727,6.952 29.235,6.952 29.616,6.952
+12V: 12V.1 C23.2 pad.@37.44,4.175 R17.2 U4.1 U?.2 | length 8.2
  Top Layer w0.305: 12V.1 38.21,8.128 U?.2@38.863,8.128
  Top Layer w0.381: pad.@37.44,4.175 37.44,6.705 U?.2@38.863,8.128
GND: C1.1 C2.1 C3.1 C4.1 C5.1 C6.1 C7.2 C8.2 C9.2 C10.1 C11.1 C12.1 C13.1 C14.1 C15.2 C16.2 C17.2 C18.2 C19.2 C20.1 C21.2 C22.1 C23.1 C25.1 C26.1 C28.1 C29.1 C30.1 C31.1 C32.2 C33.2 C34.1 C35.1 C37.1 C38.1 C39.1 C40.1 D1.1 D2.2 D3.1 D4.2 GND.1 H1.2 pad.@43.44,4.175 pad.MH133 R4.1 R5.2 R6.2 R11.2 R20.1 R21.1 R24.1 R27.1 R28.1 U1.A9 U1.B5 U1.B8 U1.C3 U1.C4 U1.C5 U1.C6 U1.C7 U1.C9 U1.D3 U1.D4 U1.D5 U1.D6 U1.D7 U1.D9 U1.E3 U1.E4 U1.E5 U1.E6 U1.F3 U1.F4 U1.F5 U1.F7 U1.F8 U1.F9 U1.G1 U1.G4 U1.G7 U3.33 U4.2 U5.2 U6.4 U6.9 U7.2 U?.1 Y1.2 Y1.4
  other v1: 1.802,1.016 2.286,1.016 2.805,1.016 3.323,1.016 3.866,1.016 4.384,1.016 4.903,1.016 5.422,1.016 5.94,1.016 6.459,1.016 6.978,1.016 7.496,1.016 8.015,1.016 8.534,1.016 9.052,1.016 9.571,1.016 10.09,1.016 10.608,1.016 11.043,1.016 11.684,1.016 12.319,1.016 12.827,1.016 13.462,1.016 14.142,1.016 0.762,1.456 14.986,1.456 25.146,1.456 27.178,1.456 29.21,1.456 31.242,1.456 33.274,1.456 35.306,1.456 37.338,1.456 39.37,1.456 41.402,1.456 43.434,1.456 1.778,1.503 14.142,1.709 1.778,2.021 14.142,2.227 1.778,2.54 14.142,2.746 8.017,2.85 1.802,3.019 14.142,3.177 24.13,3.488 1.802,3.538 14.142,3.778 1.802,4.057 14.142,4.417 1.802,4.575 14.142,4.929 1.802,5.094 14.142,5.384 0.762,5.52 35.306,5.52 45.466,5.52 1.802,5.613 14.142,5.9 1.802,6.131 14.142,6.494 1.802,6.65 14.142,7.095 1.802,7.169 18.034,7.552 34.29,7.552 36.322,7.552 40.386,7.552 44.45,7.552 46.482,7.552 1.802,7.687 14.142,7.735 1.802,8.206 14.142,8.247 1.802,8.714 2.286,8.714 2.805,8.714 3.323,8.714 3.866,8.714 4.384,8.714 4.903,8.714 5.422,8.714 5.94,8.714 6.459,8.714 6.978,8.714 7.496,8.714 8.015,8.714 8.534,8.714 9.052,8.714 9.571,8.714 10.09,8.714 10.608,8.714 11.043,8.714 11.999,8.714 12.467,8.714 12.986,8.714 13.505,8.714 14.142,8.762 10.912,9.493 12.092,9.493 0.762,9.584 2.794,9.584 4.826,9.584 6.858,9.584 8.89,9.584 12.954,9.584 14.986,9.584 17.018,9.584 19.05,9.584 21.082,9.584 23.114,9.584 31.242,9.584 10.912,10.012 12.092,10.012 10.912,10.53 12.092,10.53 10.912,11.049 12.092,11.049 10.913,11.593 12.092,11.593 1.778,11.616 3.81,11.616 5.842,11.616 7.874,11.616 9.906,11.616 13.97,11.616 46.482,11.616 10.913,12.112 12.092,12.112 10.913,12.631 12.092,12.631 27.957,12.82 28.539,12.82 29.165,12.82 27.463,13.038 10.913,13.149 12.092,13.149 29.486,13.299 27.463,13.488 30.096,13.62 0.762,13.648 2.794,13.648 4.826,13.648 6.858,13.648 8.89,13.648 14.986,13.648 37.338,13.648 43.434,13.648 10.913,13.668 12.092,13.668 19.177,13.716 26.255,13.75 20.129,13.9 27.178,13.938 10.912,14.154 12.087,14.148 30.096,14.255 13.651,14.312 26.798,14.422 20.185,14.5 12.309,14.562 30.096,14.805 26.671,14.955 19.227,15.193 30.096,15.355 26.671,15.555 1.778,15.68 3.81,15.68 5.842,15.68 7.874,15.68 9.906,15.68 18.034,15.68 46.482,15.68 30.029,15.823 12.247,15.945 26.448,16.063 29.607,16.144 25.065,16.265 14.859,16.321 12.205,16.537 29.285,16.567 10.418,16.909 28.913,16.939 41.783,17.018 15.616,17.078 23.465,17.065 23.865,17.065 24.265,17.065 24.665,17.065 12.953,17.161 27.385,17.168 27.957,17.168 28.448,17.168 9.903,17.214 37.379,17.267 38.269,17.267 39.158,17.267 27.047,17.33 23.465,17.465 23.865,17.465 24.265,17.465 24.665,17.465 25.065,17.465 12.548,17.472 9.209,17.516 2.794,17.712 4.826,17.712 6.858,17.712 12.954,17.712 33.805,17.726 16.285,17.836 23.065,17.865 23.465,17.865 23.865,17.865 24.265,17.865 24.665,17.865 11.832,17.877 11.032,17.919 8.704,17.946 10.408,18.033 37.378,18.116 38.269,18.116 39.158,18.116 20.74,18.18 21.34,18.18 23.465,18.265 23.865,18.265 24.265,18.265 2.314,18.415 2.953,18.415 3.554,18.415 4.148,18.415 4.664,18.415 5.207,18.415 5.842,18.415 6.354,18.415 6.993,18.415 7.595,18.415 8.189,18.415 9.906,18.415 10.418,18.415 11.057,18.415 11.659,18.415 12.253,18.415 12.769,18.415 13.311,18.415 13.827,18.415 14.248,18.415 26.722,18.46 27.387,18.457 28.032,18.51 28.667,18.51 15.756,18.631 23.465,18.665 23.865,18.665 24.665,18.665 25.065,18.665 16.781,18.702 1.802,18.902 14.248,18.931 37.379,19.036 38.269,19.036 39.158,19.036 23.065,19.065 24.665,19.065 20.71,19.4 1.802,19.42 14.248,19.466 22.665,19.465 23.465,19.465 23.865,19.465 24.665,19.465 15.96,19.662 18.034,19.744 22.098,19.744 30.226,19.744 42.418,19.744 46.482,19.744 33.805,19.866 1.802,19.939 14.248,19.983 23.873,19.98 20.712,20.054 22.606,20.076 17.004,20.23 8.017,20.25 23.474,20.299 24.866,20.305 1.802,20.419 14.248,20.577 16.166,20.662 26.676,20.708 27.28,20.708 27.946,20.708 24,20.765 22.423,20.888 1.802,20.938 17.704,21.051 25.313,21.042 23.379,21.098 14.248,21.178 16.645,21.397 24.423,21.423 1.802,21.457 18.495,21.672 21.868,21.672 25.951,21.705 0.762,21.776 14.986,21.776 21.082,21.776 27.178,21.776 29.21,21.776 33.274,21.776 35.306,21.776 39.37,21.776 14.248,21.817 23.071,21.881 1.802,21.975 24.92,22.014 17.245,22.092 19.428,22.092 26.692,22.132 20.33,22.175 21.159,22.175 27.564,22.316 14.248,22.329 22.533,22.442 1.802,22.494 28.375,22.525 25.531,22.578 14.248,22.784 18.034,22.784 21.861,22.877 26.207,22.996 1.802,23.013 18.772,23.028 28.94,23.029 26.931,23.116 19.582,23.145 20.286,23.145 21.082,23.145 27.707,23.205 14.248,23.3 1.802,23.531 28.281,23.66 29.357,23.741 27.686,23.784 16.002,23.808 18.034,23.808 20.066,23.808 22.098,23.808 24.13,23.808 26.162,23.808 32.258,23.808 34.29,23.808 36.322,23.808 38.354,23.808 40.386,23.808 42.418,23.808 44.45,23.808 46.482,23.808 14.248,23.894 1.802,24.05 14.248,24.495 1.802,24.569 27.771,24.93 30.003,24.93 1.802,25.087 14.248,25.135 27.417,25.244 30.279,25.244 30.537,25.521 1.802,25.606 27.178,25.621 28.94,25.621 14.248,25.647 28.581,25.704 0.762,25.84 14.986,25.84 17.018,25.84 19.05,25.84 21.082,25.84 23.114,25.84 25.146,25.84 29.409,25.85 30.734,25.85 31.242,25.84 33.274,25.84 35.306,25.84 37.338,25.84 39.37,25.84 41.402,25.84 43.434,25.84 45.466,25.84 26.931,25.985 28.323,26.087 29.695,26.087 1.802,26.114 2.392,26.114 2.91,26.114 3.429,26.114 3.971,26.114 4.49,26.114 5.009,26.114 5.527,26.114 6.046,26.114 6.565,26.114 7.083,26.114 7.602,26.114 8.121,26.114 8.639,26.114 9.158,26.114 9.677,26.114 10.195,26.114 10.714,26.114 11.149,26.114 11.601,26.114 12.105,26.114 12.573,26.114 13.092,26.114 13.61,26.114 14.248,26.162 31.04,26.218 31.559,26.218 32.078,26.218 32.596,26.218 33.115,26.218 33.634,26.218 34.228,26.218 34.813,26.218 35.389,26.218 35.9,26.218 26.797,26.411 28.789,26.411 29.131,26.411 36.361,26.475 36.822,26.713 26.521,26.97 31.04,27.051 31.559,27.051 32.078,27.051 32.596,27.051 40.561,27.293 15.367,27.305 15.879,27.305 16.518,27.305 17.12,27.305 17.714,27.305 18.23,27.305 18.772,27.305 19.407,27.305 19.919,27.305 20.559,27.305 21.16,27.305 21.754,27.305 22.352,27.305 22.86,27.305 23.471,27.305 23.983,27.305 24.623,27.305 25.224,27.305 25.818,27.305 26.334,27.305 27.813,27.305 33.02,27.305 33.532,27.305 34.171,27.305 34.773,27.305 35.367,27.305 35.883,27.305 37.572,27.305 38.212,27.305 38.813,27.305 39.407,27.305 40.005,27.305 41.124,27.305 41.636,27.305 42.276,27.305 42.877,27.305 43.471,27.305 43.987,27.305 44.53,27.305 45.046,27.305 45.466,27.305 15.367,27.792 33.02,27.792 27.813,27.821 45.466,27.821 1.778,27.872 3.81,27.872 5.842,27.872 7.874,27.872 9.906,27.872 11.938,27.872 13.97,27.872 28.194,27.872 30.226,27.872 32.258,27.872 46.482,27.872 15.367,28.31 33.02,28.31 27.813,28.356 45.466,28.356 15.367,28.829 33.02,28.829 27.813,28.873 45.466,28.873 21.599,29.179 39.21,29.179 15.367,29.309 33.02,29.309 27.813,29.467 45.466,29.467 15.367,29.828 33.02,29.828 0.762,29.904 2.794,29.904 4.826,29.904 6.858,29.904 8.89,29.904 10.922,29.904 12.954,29.904 14.986,29.904 29.21,29.904 31.242,29.904 27.813,30.068 45.466,30.068 15.367,30.347 33.02,30.347 27.813,30.707 45.466,30.707 15.367,30.865 33.02,30.865 27.813,31.219 45.466,31.219 15.367,31.384 33.02,31.384 27.813,31.674 45.466,31.674 15.367,31.903 33.02,31.903 1.778,31.936 3.81,31.936 5.842,31.936 7.874,31.936 9.906,31.936 11.938,31.936 13.97,31.936 28.194,31.936 30.226,31.936 32.258,31.936 46.482,31.936 27.813,32.19 45.466,32.19 15.367,32.421 33.02,32.421 27.813,32.784 45.466,32.784 15.367,32.94 33.02,32.94 27.813,33.385 45.466,33.385 15.367,33.459 33.02,33.459 0.762,33.968 6.858,33.968 8.89,33.968 10.922,33.968 12.954,33.968 14.986,33.968 15.367,33.977 29.21,33.968 31.242,33.968 33.02,33.977 27.813,34.025 45.466,34.025 15.367,34.496 33.02,34.496 27.813,34.537 45.466,34.537 15.367,35.004 15.957,35.004 16.476,35.004 16.994,35.004 17.537,35.004 18.055,35.004 18.574,35.004 19.093,35.004 19.611,35.004 20.13,35.004 20.649,35.004 21.167,35.004 21.686,35.004 22.205,35.004 22.723,35.004 23.242,35.004 23.761,35.004 24.279,35.004 24.714,35.004 25.167,35.004 25.67,35.004 26.138,35.004 26.657,35.004 27.176,35.004 33.02,35.004 33.61,35.004 34.129,35.004 34.647,35.004 35.19,35.004 35.708,35.004 36.227,35.004 36.746,35.004 37.264,35.004 37.783,35.004 38.302,35.004 38.82,35.004 39.339,35.004 39.858,35.004 40.376,35.004 40.895,35.004 41.414,35.004 41.932,35.004 42.367,35.004 42.82,35.004 43.323,35.004 43.791,35.004 44.31,35.004 44.829,35.004 27.813,35.052 45.466,35.052
GPIO02: R19.1 U1.E2 | length 4.7
  Top Layer w0.203: R19.1 23.625,12.307 23.673,12.356 23.673,12.731 23.886,12.944 v1(23.886,12.956)
  Bottom Layer w0.203: v1(23.886,12.956) 23.892,12.956 24.265,13.329 v1(24.265,16.665)
GPIO08: R21.2 U1.F1 | length 2.3
  Top Layer w0.203: U1.F1 24.665,16.012 25.59,15.087 R21.2
INT: INT1.1 U1.C2 U3.7 | length 23.2
  Top Layer w0.203: v1(34.405,16.891) 34.44,16.856 35.858,16.856 U3.7
  Bottom Layer w0.203: v1(23.465,16.665) 23.465,14.522 22.352,13.409 22.352,12.065 23.266,11.151 31.852,11.151 34.051,13.35 34.051,16.537 v1(34.405,16.891)
LOG: LOG.1 R12.1 | length 11.8
  Top Layer w0.203: R12.1@22.902,11.701 23.559,11.044 31.634,11.044 31.916,11.325 32.612,11.325 33.352,12.065 LOG.1@34,12.065
M_SWCLK: H1.4 M_SWCLK.1 R4.2 U3.24 | length 27.3
  Top Layer w0.203: M_SWCLK.1 41.321,9.017 44.704,9.017 45.466,9.779 45.466,21.844 44.494,22.816 43.815,22.816 ; U3.24 41.24,19.866 41.741,20.367 R4.2 42.041,21.036 42.341,21.336 42.341,22.329 42.828,22.816 43.815,22.816 ; H1.4 43.815,22.816
M_SWDIO: H1.3 M_SWDIO.1 R1.1 U3.23 | length 19.6
  Top Layer w0.203: U3.23 41.631,19.366 R1.1 41.741,19.726 42.291,20.276 43.815,20.276 ; M_SWDIO.1@42,10.287 42.4,10.287 43.314,9.373 44.425,9.373 45.085,10.033 45.085,19.387 44.196,20.276 43.815,20.276 ; H1.3 43.815,20.276
NetC1_2: C1.2 R2.2 U1.H9 | length 3.6
  Top Layer w0.203: U1.H9 27.643,19.465 27.946,19.768 C1.2 R2.2
NetC2_2: C2.2 U1.G6 | length 3.7
  Bottom Layer w0.203: v1(25.065,18.265) 25.42,17.91 26.766,17.91 27.008,17.91 v1(28.667,17.91)
NetC5_2: C5.2 C6.2 U1.A7 | length 2
  Top Layer w0.203: C6.2 C5.2 21.455,18.665 U1.A7
NetC10_2: C10.2 U1.H2 U1.H3 | length 3.1
  Top Layer w0.203: U1.H3 U1.H2 25.476,16.654 25.626,16.654 25.946,16.334 25.946,14.968 26.255,14.658 C10.2
NetC11_2: C11.2 U1.H7 | length 2.9
  Top Layer w0.203: U1.H7 25.872,18.665 26.318,18.218 26.318,18.216 26.452,18.082 26.455,18.082 26.476,18.06 27.882,18.06 C11.2
NetC13_2: C13.2 C14.2 U1.G9 | length 2.6
  Top Layer w0.203: U1.G9 25.076,19.476 25.076,19.626 25.304,19.854 25.558,20.108 C13.2 C14.2
NetC18_1: C18.1 U1.H5 Y1.3 | length 5.2
  Top Layer w0.203: U1.H5 25.501,17.829 25.616,17.829 25.624,17.821 25.784,17.821 26.346,17.259 26.349,17.259 26.864,16.744 28.492,16.744 28.823,16.413 C18.1 28.823,15.889 Y1.3
NetC19_1: C19.1 U1.H4 Y1.1 | length 5.6
  Top Layer w0.203: U1.H4 25.636,17.465 26.198,16.903 26.202,16.903 27.102,16.003 27.102,14.805 27.652,14.255 Y1.1 27.957,13.62 C19.1
NetC21_1: C21.1 EN.1 R8.2 U1.B7 | length 42.2
  Top Layer w0.203: v1(19.428,17.465) 18.296,17.465 15.681,14.85 15.681,9.894 16.66,8.915 19.173,8.915 22.246,5.842 33.41,5.842 35.052,7.484 35.052,11.066 EN.1@36.051,12.065 ; R8.2 19.432,18.144 C21.1 v1@19.435,17.472
  Bottom Layer w0.203: v1(19.428,17.465) 19.428,17.909 20.184,18.665 v1(23.065,18.665)
NetC24_2: C24.2 R15.1 R20.2 U4.4 | length 3.6
  Top Layer w0.254: R20.2 28.485,4.983 R15.1 28.527,4.043 C24.2 30.233,4.902 U4.4
NetC25_2: C25.2 R17.1 U4.3 | length 3.4
  Top Layer w0.254: U4.3 32.865,4.887 C25.2 34.886,4.887 35.061,4.712 R17.1
NetC27_2: C27.2 R22.1 R24.2 U5.4 | length 3.3
  Top Layer w0.254: R24.2 R22.1 23.008,8.809 C27.2 24.399,9.459 U5.4
NetC29_2: C29.2 R23.2 U5.3 | length 2.2
  Top Layer w0.254: U5.3 28.045,9.459 28.245,9.259 C29.2 28.972,9.259 29.165,9.065 R23.2
NetC30_2: C30.2 C31.2 R25.2 R26.1 U6.8 | length 3.8
  Top Layer w0.147: U6.8 18.081,13.662 C30.2 C31.2 R26.1 R25.2
NetC36_1: C36.1 R28.2 R29.1 U7.5 | length 3.5
  Top Layer w0.254: R28.2 20.846,5.704 C36.1 21.35,5.597 U7.5
NetL1_1: L1.1 U7.3 | length 6.8
  Top Layer w0.203: L1.1 19.721,1.42 21.745,3.443 23.574,3.443 24.064,2.953 U7.3
NetM_LOG_1: M_LOG.1 U3.19 | length 6
  Top Layer w0.203: U3.19 v1(41.24,17.366)
  Bottom Layer w0.147: v1(41.24,17.366) 41.24,13.097 v1(42.051,12.287)
NetR5_1: R5.1 U3.31 | length 1.3
  Top Layer w0.203: U3.31 R5.1
NetR9_2: R9.2 U1.G2 | length 3.1
  Top Layer w0.203: R9.2 24.935,14.805 25.051,14.921 25.051,15.073 v1(25.06,15.082)
  Bottom Layer w0.203: v1(25.06,15.082) 25.781,15.803 25.781,16.265 25.381,16.665 v1(25.065,16.665)
NetR10_2: R10.2 U1.F2 | length 2.5
  Top Layer w0.203: R10.2 24.265,14.783 24.561,15.078 24.635,15.078 v1(24.644,15.087)
  Bottom Layer w0.203: v1(24.644,15.087) 24.665,15.108 v1(24.665,16.665)
NetR12_2: R12.2 U1.D2 | length 4.8
  Top Layer w0.203: R12.2 v1(22.895,12.82)
  Bottom Layer w0.203: v1(22.895,12.82) 22.895,13.431 23.865,14.4 23.865,16.36 v1(23.865,16.665)
NetR13_2: R13.2 U1.C1 | length 1.5
  Top Layer w0.203: R13.2 23.465,15.553 U1.C1
NetR14_2: R14.2 U1.D1 | length 1.4
  Top Layer w0.203: R14.2 23.865,15.248 U1.D1
NRST: C9.1 H1.1 NRST.1 R3.1 U3.4 | length 28.4
  Top Layer w0.203: v1(34.405,19.036) R3.1 34.44,18.366 U3.4
  Bottom Layer w0.203: v1(34.405,19.036) 34.657,19.036 36.322,20.701 40.894,20.701 42.799,18.796 42.799,16.256 43.859,15.196 44.196,15.196 44.196,9.906 43.688,9.398 38.94,9.398 v1(38.051,10.287)
QSPI_CLK: U1.B4 U6.6 | length 7.3
  Top Layer w0.147: v1(17.696,14.648) 17.71,14.662 U6.6
  Bottom Layer w0.147: v1(17.696,14.648) 19.316,14.648 22.133,17.465 v1(23.065,17.465)
QSPI_CSN: R25.1 U1.A2 U6.1 | length 6.1
  Top Layer w0.147: R25.1 21.007,12.957 U6.1 21.515,13.662 22.279,14.425 22.279,16.353 22.526,16.601 22.601,16.601 U1.A2
QSPI_IO0: U1.A5 U6.5 | length 5.3
  Top Layer w0.147: U6.5 19.648,16.353 20.748,16.353 22.26,17.865 U1.A5
QSPI_IO1: U1.A3 U6.2 | length 3.9
  Top Layer w0.147: U6.2 21.365,14.162 21.979,14.775 21.979,16.599 22.422,17.042 22.642,17.042 U1.A3
QSPI_IO2: U1.A4 U6.3 | length 3.8
  Top Layer w0.147: U6.3 21.357,14.662 21.679,14.985 21.679,16.723 22.422,17.465 U1.A4
QSPI_IO3: U1.B3 U6.7 | length 7.4
  Top Layer w0.147: v1(17.681,14.162) U6.7
  Bottom Layer w0.147: v1(17.681,14.162) 19.3,14.162 22.203,17.065 v1(23.065,17.065)
RF0: R6.5 U1.E9 | length 7.5
  Top Layer w0.203: U1.E9 cw(c27.387,19.465) 25.179,21.672 25.381,21.874 cw(c27.455,19.8) 27.455,22.733 ccw(c27.455,24.254) 28.53,23.178 ccw(c27.641,24.068) 28.899,24.068 R6.5
RF0_CTRL: C38.2 R6.6 RF0_CTRL.1 U1.B2 | length 42
  Top Layer w0.203: R6.6 v1(31.414,24.384)
  Bottom Layer w0.203: v1(23.065,16.665) 23.065,14.67 21.717,13.322 21.717,11.303 22.225,10.795 38.354,10.795 39.116,11.557 39.116,13.789 31.414,21.491 v1(31.414,24.384)
RF2: R11.5 U1.B9 | length 15.3
  Top Layer w0.203: R11.5 13.651,16.112 ccw(c13.651,17.102) 14.352,16.402 15.639,17.689 ccw(c13.843,19.485) 16.383,19.485 cw(c18.704,19.485) 17.062,21.126 17.736,21.8 cw(c19.989,19.546) 19.989,22.733 20.596,22.733 cw(c20.596,20.193) 22.392,21.989 22.423,21.958 cw(c20.873,20.408) 23.065,20.408 U1.B9
RF2_CTRL: C40.2 R11.6 RF2_CTRL.1 U1.B1 | length 21
  Top Layer w0.203: R11.6 13.521,17.106 C40.2 13.898,17.483 13.91,17.483 13.964,17.536 v1(14.799,17.536) ; v1(22.63,15.517) 23.052,15.94 23.052,16.252 U1.B1
  Bottom Layer w0.203: v1(14.799,17.536) 14.799,17.652 RF2_CTRL.1 14.425,17.712 14.248,17.536 14.105,17.536 12.7,16.131 12.7,14.351 16.092,10.959 18.071,10.959 v1(22.63,15.517)
RX0: D3.2 R11.3 | length 15.7
  Top Layer w0.203: v1(8.017,2.1) 10.731,4.814 ccw(c8.935,6.61) 11.475,6.61 D3.2 ccw(c11.475,15.798) 12.216,15.057 R11.3
RX1: D4.1 R11.1 | length 5.9
  Top Layer w0.203: v1(8.017,19.5) 9.425,18.092 ccw(c11.221,19.888) 11.221,17.348 D4.1 cw(c11.475,15.996) 12.431,16.952 R11.1
RXD: R9.1 R16.1 RXD.1 U3.9 | length 20.5
  Top Layer w0.203: R9.1 R16.1 29.96,12.307 30.607,12.954 30.607,14.176 32.147,15.716 U3.9 36.519,15.17 39.624,12.065 RXD.1@40.051,12.065
SWCLK: CLK.1 R13.1 | length 13.5
  Top Layer w0.203: R13.1 22.93,14.349 22.93,14 22.369,13.439 22.369,11.227 23.309,10.287 CLK.1@32.062,10.287
SWDIO: DIO1.1 R14.1 | length 10.9
  Top Layer w0.203: v1(23.6,13.578) R14.1
  Bottom Layer w0.203: v1(23.6,13.578) 23.441,13.419 23.441,12.617 24.149,11.909 28.015,11.909 31.673,11.909 v1(32.051,12.287)
TX0: D1.2 R6.3 | length 8.5
  Top Layer w0.203: v1(21.599,28.429) 24.725,28.429 cw(c24.725,25.889) 26.521,27.685 D1.2 ccw(c29.161,26.67) 28.012,25.521 R6.3
TX1: D2.1 R6.1 | length 11.4
  Top Layer w0.203: R6.1 29.928,25.663 ccw(c28.922,26.67) D2.1 35.026,26.67 ccw(c35.026,29.21) 36.822,27.414 37.093,27.685 cw(c38.89,25.889) 38.89,28.429 v1(39.21,28.429)
TXD: R10.1 R18.1 TXD.1 U3.8 | length 34.3
  Top Layer w0.203: R18.1 v1(24.265,12.731) R10.1 ; v1(31.414,20.132) 31.414,17.05 32.097,16.366 U3.8
  Bottom Layer w0.203: v1(24.265,12.731) 24.677,12.319 31.374,12.319 33.257,14.202 cw(c34.051,13.861) 33.416,14.447 33.416,16.581 34.575,17.74 ; v1(31.414,20.132) 32.184,20.132 34.575,17.74 ; v1(38.051,12.287) 38.051,14.265 34.575,17.74
UWB_CHIPEN: C20.2 R7.1 R8.1 | length 1.3
  Top Layer w0.203: R8.1 20.035,18.783 R7.1
UWB_EXTEN: R26.2 R27.2 U1.B6 U7.1 | length 27
  Top Layer w0.203: v1(16.51,10.033) v1(16.51,11.938) 16.554,11.982 R26.2 ; v1(21.127,1.143) R27.2 U7.1
  Bottom Layer w0.203: v1(16.51,10.033) 16.51,5.76 v1(21.127,1.143) ; v1(16.51,11.938) 16.51,15.289 18,16.779 19.644,16.779 20.33,17.465 21.403,17.465 22.203,18.265 v1(23.065,18.265)
VCC: C3.2 C4.2 C15.1 C16.1 C17.1 C26.2 C27.1 C37.2 C39.2 R1.2 R2.1 R3.2 R6.4 R7.2 R11.4 R16.2 R18.2 R19.2 R22.2 U1.A8 U3.1 U3.5 U3.17 U5.5 VCC.1 | length 130.1
  Top Layer w0.203: C39.2 13.651,15.582 R11.4 14.799,15.712 19.141,20.054 R7.2 19.435,20.343 19.804,20.712 v2(21.312,20.712) ; R19.2 R18.2 ; v1(24.265,11.53) R18.2 ; R16.2 R18.2 ; v2(26.931,24.384) 27.732,24.384 R6.4 ; R2.1 v2(28.92,20.708) ; U3.17 41.038,16.366 v2@41.741,15.663 ; C15.1 v2@41.741,15.663 ; v2@41.762,15.6 42.051,15.311 v2(42.051,14.986) 42.051,14.065 VCC.1@44.051,12.065 ; v2(41.783,15.621) v2@41.741,15.663 ; v1(42.341,18.574) R1.2
  Top Layer w0.254: v2(21.312,20.712) C3.2 21.31,20.052 C4.2 21.521,19.4 21.861,19.06 U1.A8@22.606,19.06 ; v2(32.5,17.226) 32.5,17.866 33.035,18.401 R3.2 ; v2@32.893,17.018 v2(33.02,17.018) 33.907,17.018 34.405,17.516 C16.1 34.545,17.866 U3.5 ; v2(34.405,20.476) C17.1 U3.1
  Layer 2 w0.203: 24.265,7.62 v1(24.265,11.53) ; v2(26.931,24.384) 29.444,24.384 30.48,23.348 30.48,22.268 v2(28.92,20.708) ; v2(41.783,15.621) 42.341,16.179 v1(42.341,18.574)
  Layer 2 w0.254: v2(32.5,17.226) 32.5,17.83 34.405,19.735 v2(34.405,20.476)
  Layer 2 w0.508: v2(21.312,20.712) 20.209,20.712 15.941,16.444 15.941,6.543 14.78,5.382 14.78,3.177 15.211,2.746 22.591,2.746 23.574,3.729 23.574,6.731 v1(23.156,6.731) 23.617,7.192 ; 24.265,7.62 24.892,7.62 ; 24.892,7.353 24.892,7.62 ; v2(28.92,20.708) 28.92,19.707 31.242,17.385 31.242,11.303 29.982,10.043 25.918,10.043 24.892,9.017 24.892,7.62 ; v2@32.956,16.954 34.925,14.986 ; 41.783,14.986 34.925,14.986 ; 24.892,7.62 32.512,7.62 34.925,10.033 34.925,14.986
  other v1: 22.86,6.477 23.156,6.477 22.819,6.731
  other v2: 29.607,20.686 20.63,21.147
pads on no net: U1.A1 U1.E1 U1.G3 U1.G5 U1.H1 U1.H6 U3.2 U3.3 U3.6 U3.10 U3.11 U3.12 U3.13 U3.14 U3.15 U3.16 U3.18 U3.20 U3.21 U3.22 U3.25 U3.26 U3.27 U3.28 U3.29 U3.30 U3.32

## Polygon pours and split planes (outlines as drawn)
TX0 on Bottom Layer "NONET_L-01_P-001" (solid, pour order 16): 16.099,27.929 27.099,27.929 27.099,34.429 16.099,34.429
GND on Bottom Layer "NONET_L-01_P-001" (solid, pour order 21): 0,2 0,34 cw(c2,34) 2,36 46,36 cw(c46,34) 48,34 48,2 cw(c46,2) 46,0 2,0 cw(c2,2)
RX0 on Bottom Layer "NONET_L-01_P-001" (solid, pour order 14): 2.517,1.6 13.517,1.6 13.517,8.1 2.517,8.1
RX1 on Bottom Layer "NONET_L-01_P-001" (solid, pour order 15): 2.517,19 13.517,19 13.517,25.5 2.517,25.5
TX1 on Bottom Layer "NONET_L-01_P-001" (solid, pour order 17): 33.71,27.929 44.71,27.929 44.71,34.429 33.71,34.429
TX1 on Bottom Layer "NONET_L-01_P-001" (solid, pour order 13): 33.71,27.929 44.71,27.929 44.71,34.429 33.71,34.429
GND on Layer 1 "NONET_L-01_P-001" (solid, pour order 19): 0,2 0,34 cw(c2,34) 2,36 46,36 cw(c46,34) 48,34 48,2 cw(c46,2) 46,0 2,0 cw(c2,2)
GND on Layer 2 "NONET_L-01_P-001" (solid, pour order 20): 0,2 0,34 cw(c2,34) 2,36 46,36 cw(c46,34) 48,34 48,2 cw(c46,2) 46,0 2,0 cw(c2,2)
GND on Top Layer "NONET_L-01_P-001" (solid, pour order 18): 0,2 0,34 cw(c2,34) 2,36 46,36 cw(c46,34) 48,34 48,2 cw(c46,2) 46,0 2,0 cw(c2,2)

## Other copper
Top Layer:
  rectangle net VCC: 28.323,20.447 29.807,21.111
  rectangle net VCC: 20.286,20.574 21.679,21.423
  rectangle net VCC: 41.24,14.375 42.5,16.266
  rectangle net VCC: 32.147,16.744 33.466,17.483
  pour cut-out: 20.933,17.792 20.933,17.733 20.992,17.733 21.001,17.724 21.28,17.724 21.336,17.78
  pour cut-out: 26.305,18.796 26.223,18.71 26.214,18.689 26.502,18.401 26.511,18.753
  pour cut-out: 21.678,13.499 22.441,14.262 22.568,14.223 22.568,14.081 22.53,13.967 22.186,13.622 22.13,13.538
  pour cut-out: 17.489,14.033 17.479,13.689 17.687,13.689 17.803,13.748 17.818,13.865 17.713,13.93 17.477,14.06
  pour cut-out: 27.714,18.755 27.714,18.796 28.075,18.846 28.264,18.825 28.301,18.833
  pour cut-out: 19.73,18.553 21.693,18.54 21.696,18.376 19.733,18.394
  region net +5V: 23.764,5.283 24.364,5.283 24.364,5.205 25.091,4.478 25.781,4.478 26.289,4.478 26.289,3.97 26.768,3.502 26.768,2.286 26.36,2.286 24.364,4.282 23.764,4.282
  pour cut-out: 36.181,15.953 36.181,20.216 40.344,20.216 40.344,15.953
  region net 1V5: 19.812,5.15 20.603,5.15 21.103,5.15 21.103,4.35 20.753,4.35 20.425,4.022 20.425,3.559 15.113,3.559 15.113,4.318 19.812,4.318
  region net VCC: 22.648,8.357 22.669,8.335 22.669,6.35 25.472,6.35 25.472,8.357
  region net +5V: 26.768,3.502 31.151,3.502 31.151,2.286 26.768,2.286
  region net +5V: 26.927,7.824 28.553,7.824 29.235,8.507 29.743,8.507 29.743,6.731 26.927,6.731
  region net +12V: 32.349,3.137 32.349,2.175 38.44,2.175 38.44,3.137
Layer 2:
  rectangle net VCC: 28.323,20.447 29.807,21.111
  rectangle net VCC: 20.286,20.408 21.679,21.423
  rectangle net VCC: 41.24,14.375 42.5,16.266
  rectangle net VCC: 32.147,16.744 33.466,17.483
  rectangle net +5V: 28.448,2.286 29.791,7.119
  pour cut-out: 33.36,27.579 45.06,27.579 45.06,34.779 33.36,34.779
  pour cut-out: 15.749,27.579 27.449,27.579 27.449,34.779 15.749,34.779
  pour cut-out: 2.167,18.65 13.867,18.65 13.867,25.85 2.167,25.85
  pour cut-out: 2.167,1.25 13.867,1.25 13.867,8.45 2.167,8.45
  region net 1V5: 15.24,4.287 22.591,4.287 22.591,3.604 20.895,3.604 15.24,3.604
  region net +5V: 26.768,3.502 29.791,3.502 29.791,2.286 26.768,2.286
  region net VCC: 22.648,8.357 22.669,8.335 22.669,6.35 25.472,6.35 25.472,8.357
Bottom Layer:
  pour cut-out: 33.367,27.586 33.367,34.772 45.053,34.772 45.053,27.586
  pour cut-out: 15.755,27.586 15.755,34.772 27.442,34.772 27.442,27.586
  pour cut-out: 2.173,18.657 2.173,25.843 13.86,25.843 13.86,18.657
  pour cut-out: 2.167,1.243 13.867,1.243 13.873,1.25 13.873,8.45 13.867,8.457 2.167,8.457 2.16,8.45
  pour cut-out: 36.71,32.679 41.71,32.679 41.71,34.179 41.21,34.179 41.21,33.179 37.21,33.179 37.21,34.179 36.71,34.179
  pour cut-out: 19.099,32.679 24.099,32.679 24.099,34.179 23.599,34.179 23.599,33.179 19.599,33.179 19.599,34.179 19.099,34.179
  pour cut-out: 5.517,25.25 6.017,25.25 6.017,24.25 10.017,24.25 10.017,25.25 10.517,25.25 10.517,23.75 5.517,23.75
  pour cut-out: 5.517,7.85 6.017,7.85 6.017,6.85 10.017,6.85 10.017,7.85 10.517,7.85 10.517,6.35 5.517,6.35

## Silkscreen, mask and mechanical layers (free items; w line width, h text height)
Bottom Solder:
  region: 2.167,1.25 2.167,8.45 13.867,8.45 13.867,1.25
  region: 33.36,27.579 33.36,34.779 45.06,34.779 45.06,27.579
  region: 15.749,27.579 15.749,34.779 27.449,34.779 27.449,27.579
  region: 2.167,18.65 2.167,25.85 13.867,25.85 13.867,18.65
Mechanical 1:
  the board outline again, w0.013
Mechanical 2:
  lines w0.013: 2.167,1.25 13.867,1.25 ; 2.167,1.25 2.167,8.45 ; 2.167,1.25 2.167,8.45 ; 2.167,1.25 13.867,1.25 ; 2.167,8.45 13.867,8.45 ; 2.167,8.45 13.867,8.45 ; 2.167,18.65 13.867,18.65 ; 2.167,18.65 2.167,25.85 ; 2.167,18.65 13.521,18.65 13.867,18.65 ; 2.167,18.65 2.167,25.85 ; 2.167,25.85 13.867,25.85 ; 2.167,25.85 13.867,25.85 ; 13.867,1.25 13.867,8.45 ; 13.867,1.25 13.867,4.109 13.867,8.45 ; 13.867,18.65 13.867,25.85 ; 13.867,18.65 13.867,25.85 ; 15.749,27.579 27.449,27.579 ; 15.749,27.579 15.749,34.779 ; 15.749,27.579 27.449,27.579 ; 15.749,27.579 15.749,34.779 ; 15.749,34.779 27.449,34.779 ; 15.749,34.779 27.449,34.779 ; 27.449,27.579 27.449,34.779 ; 27.449,27.579 27.449,34.779 ; 33.36,27.579 45.06,27.579 ; 33.36,27.579 33.36,34.779 ; 33.36,27.579 33.36,34.779 ; 33.36,27.579 45.06,27.579 ; 33.36,34.779 45.06,34.779 ; 45.06,27.579 45.06,34.779 ; 45.06,27.579 45.06,34.779 ; -0.3,-0.3 -0.3,36.3 48.3,36.3 48.3,-0.3 33.36,-0.3 15.749,-0.3 2.167,-0.3 -0.3,-0.3 ; 0,0 0,25.85 0,36 15.749,36 33.36,36 48,36 48,0 2.167,0 0,0 ; 2.517,1.6 2.517,8.1 13.517,8.1 13.517,1.6 10.517,1.6 2.517,1.6 ; 2.517,19 2.517,25.5 13.517,25.5 13.517,19 5.517,19 2.517,19 ; 5.517,6.35 5.517,7.85 6.017,7.85 6.017,6.85 10.017,6.85 10.017,7.85 10.517,7.85 10.517,6.35 5.517,6.35 ; 5.517,23.75 5.517,25.25 6.017,25.25 6.017,24.25 10.017,24.25 10.017,25.25 10.517,25.25 10.517,23.75 5.517,23.75 ; 16.099,27.929 16.099,34.429 27.099,34.429 27.099,27.929 19.099,27.929 16.099,27.929 ; 19.099,32.679 19.099,34.179 19.599,34.179 19.599,33.179 23.599,33.179 23.599,34.179 24.099,34.179 24.099,32.679 19.099,32.679 ; 33.71,27.929 33.71,34.429 44.71,34.429 44.71,27.929 36.71,27.929 33.71,27.929 ; 36.71,32.679 36.71,34.179 37.21,34.179 37.21,33.179 41.21,33.179 41.21,34.179 41.71,34.179 41.71,32.679 36.71,32.679
Mechanical 3:
  drawing of 591 lines, arcs and shapes, not listed
Mechanical 4:
  circle w0.013: c8.017,2.1 r0.1
  circle w0.013: c8.017,19.5 r0.1
  circle w0.013: c21.599,28.429 r0.1
  circle w0.013: c39.21,28.429 r0.1
  lines w0.013: -0.3,-0.3 -0.3,36.3 48.3,36.3 48.3,-0.3 -0.3,-0.3 ; 0,0 0,36 48,36 48,0 39.17,0 21.559,0 15.322,0 13.476,0 7.977,0 0,0 ; 7.815,2.06 7.815,2.14 7.845,2.215 7.902,2.272 7.977,2.302 8.057,2.302 8.132,2.272 8.189,2.215 8.219,2.14 8.219,2.06 8.189,1.985 8.132,1.928 8.057,1.898 7.977,1.898 7.902,1.928 7.845,1.985 7.815,2.06 ; 7.815,19.46 7.815,19.54 7.845,19.615 7.902,19.672 7.977,19.702 8.057,19.702 8.132,19.672 8.189,19.615 8.219,19.54 8.219,19.46 8.189,19.385 8.132,19.328 8.057,19.298 7.977,19.298 7.902,19.328 7.845,19.385 7.815,19.46 ; 21.397,28.389 21.397,28.469 21.427,28.544 21.484,28.601 21.559,28.631 21.639,28.631 21.714,28.601 21.771,28.544 21.801,28.469 21.801,28.389 21.771,28.314 21.714,28.257 21.639,28.227 21.559,28.227 21.484,28.257 21.427,28.314 21.397,28.389 ; 39.008,28.389 39.008,28.469 39.039,28.544 39.096,28.601 39.17,28.631 39.251,28.631 39.325,28.601 39.382,28.544 39.413,28.469 39.413,28.389 39.382,28.314 39.325,28.257 39.251,28.227 39.17,28.227 39.096,28.257 39.039,28.314 39.008,28.389
Mechanical 5:
  drawing of 878 lines, arcs and shapes, not listed